# Altium PCB da12_v100.PcbDoc (part 1 of 5)
Units mil, origin at the board's own origin, x right, y up, seen from the top; angles counter-clockwise.
Board outline 4646.03 x 3622.4 mil, 4 copper layers (Top Layer, GND, POWER, Bottom Layer), stack 23.756 mil thick; 376 components, 191 nets, 1000 pads, 352 vias.
Unrouted connection lines stored in the file: 152.
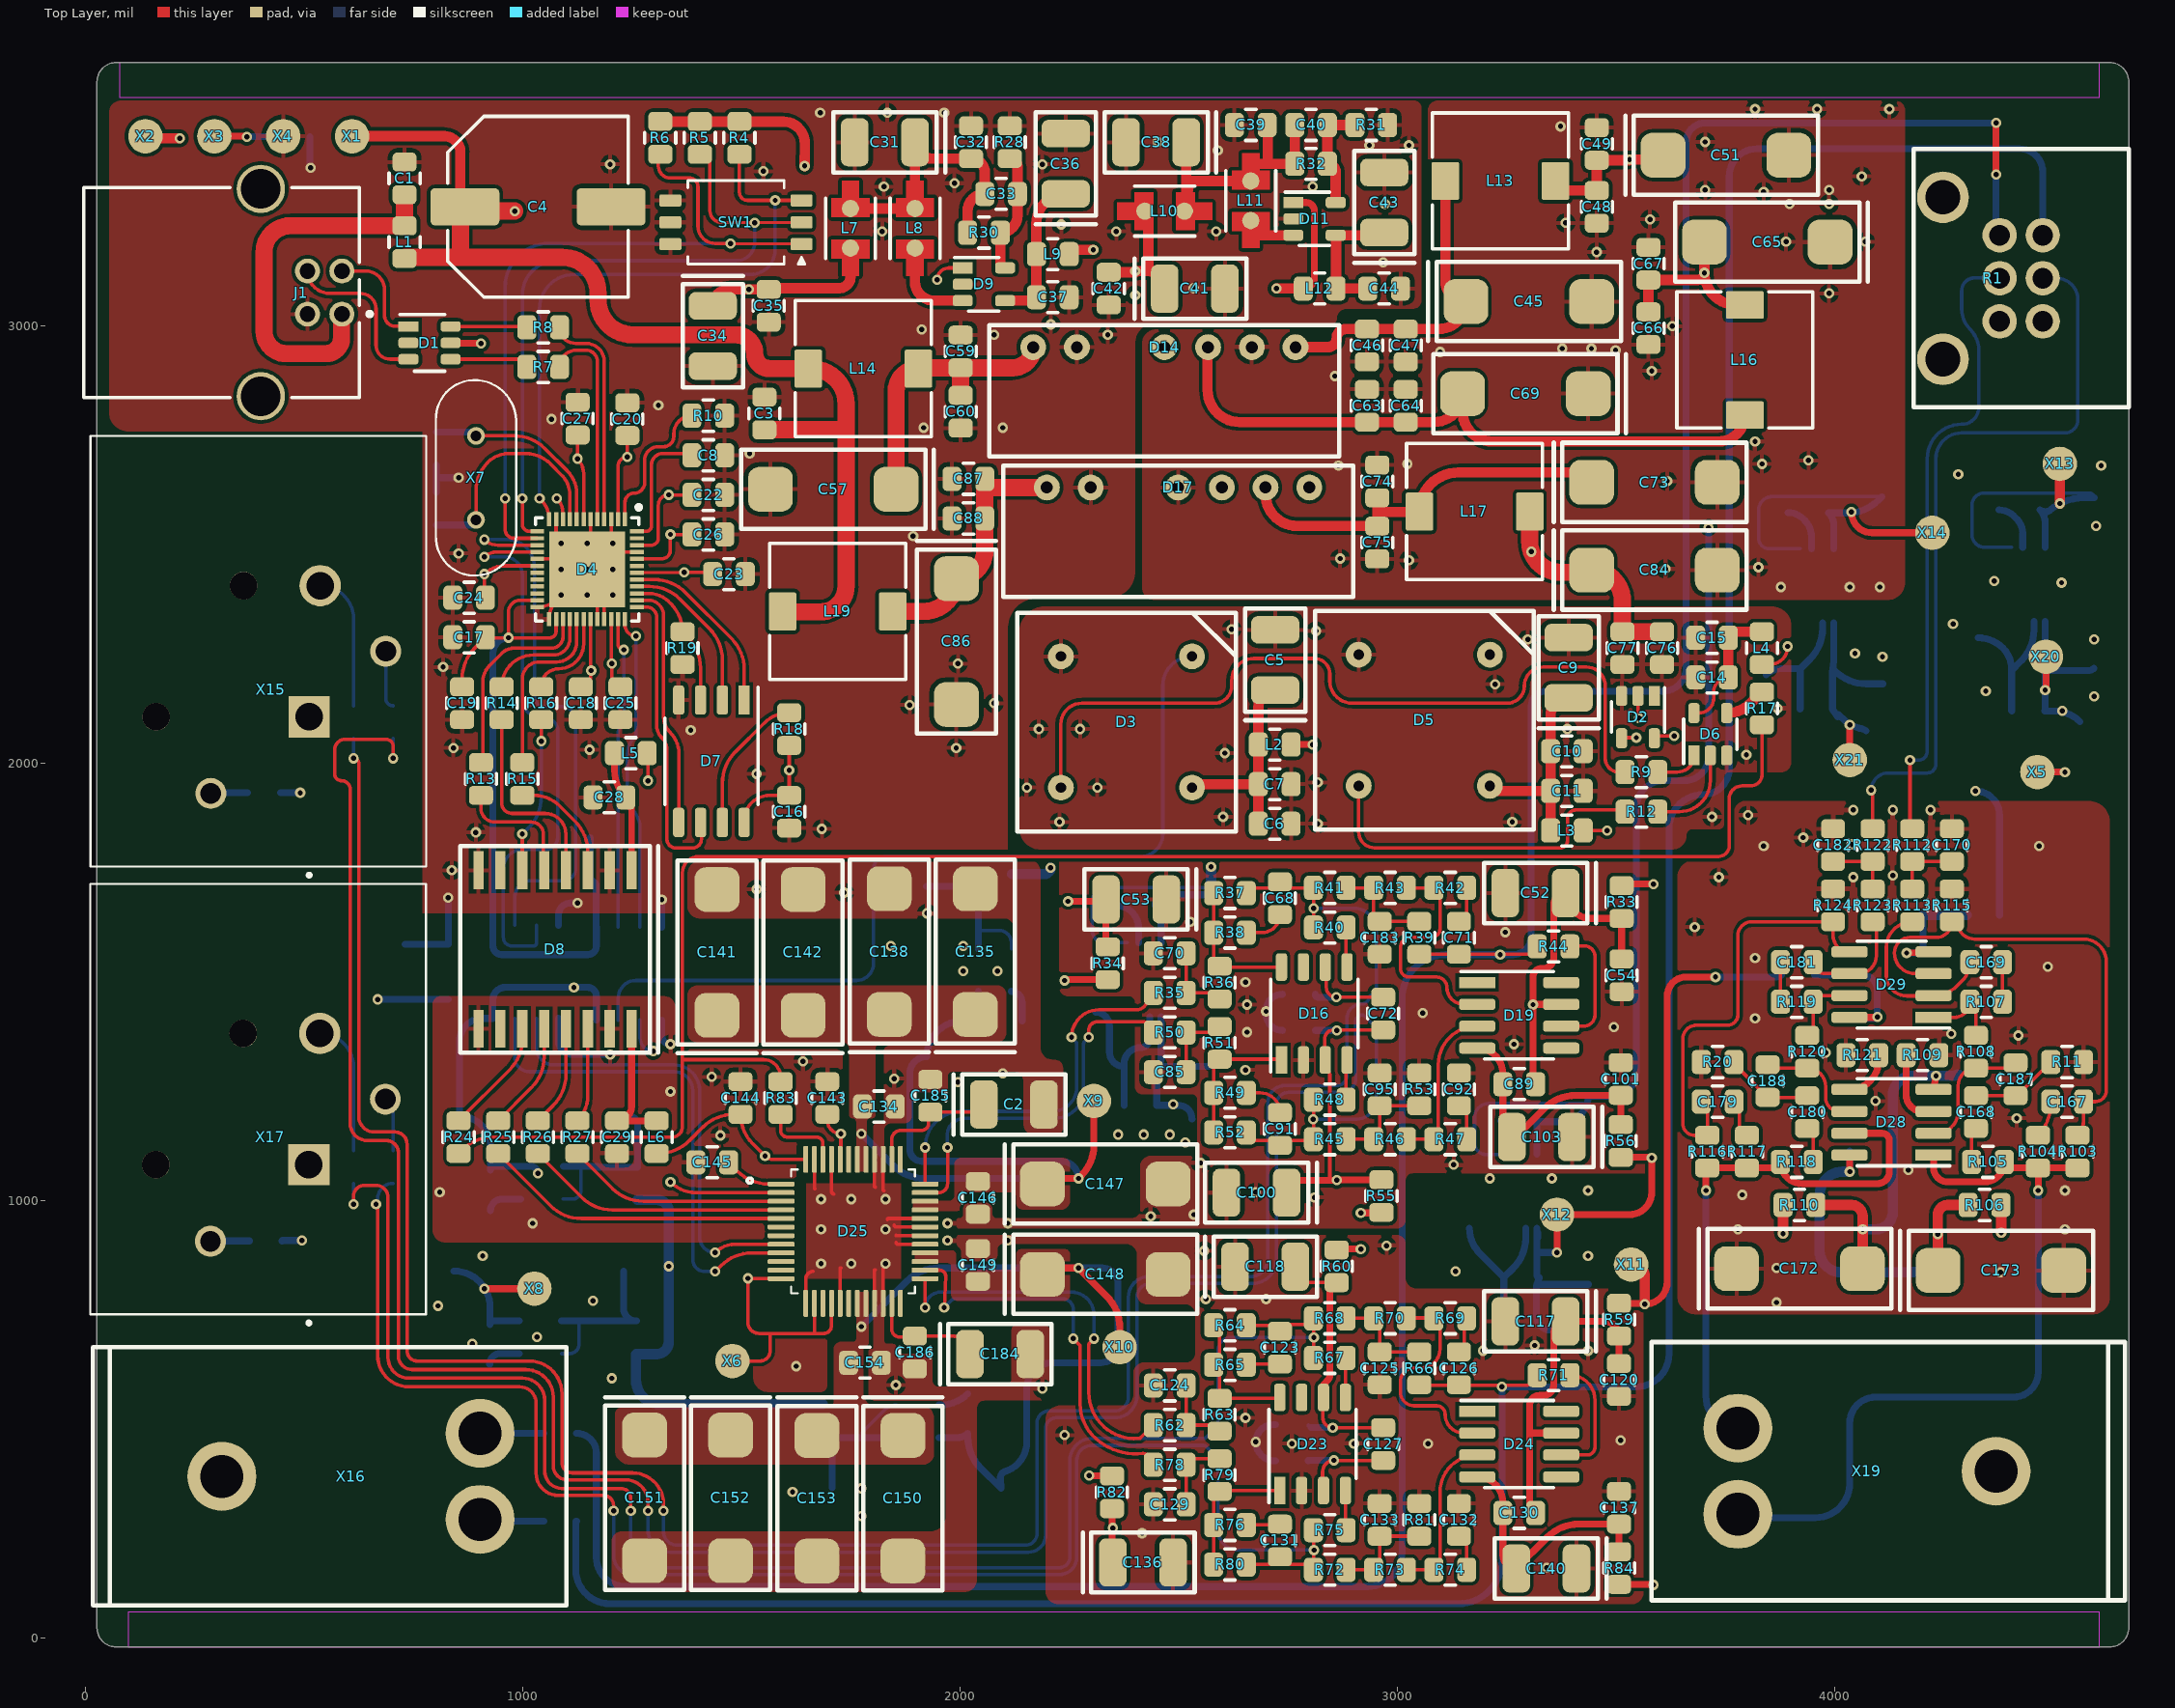
[diagram p0: Top Layer view]
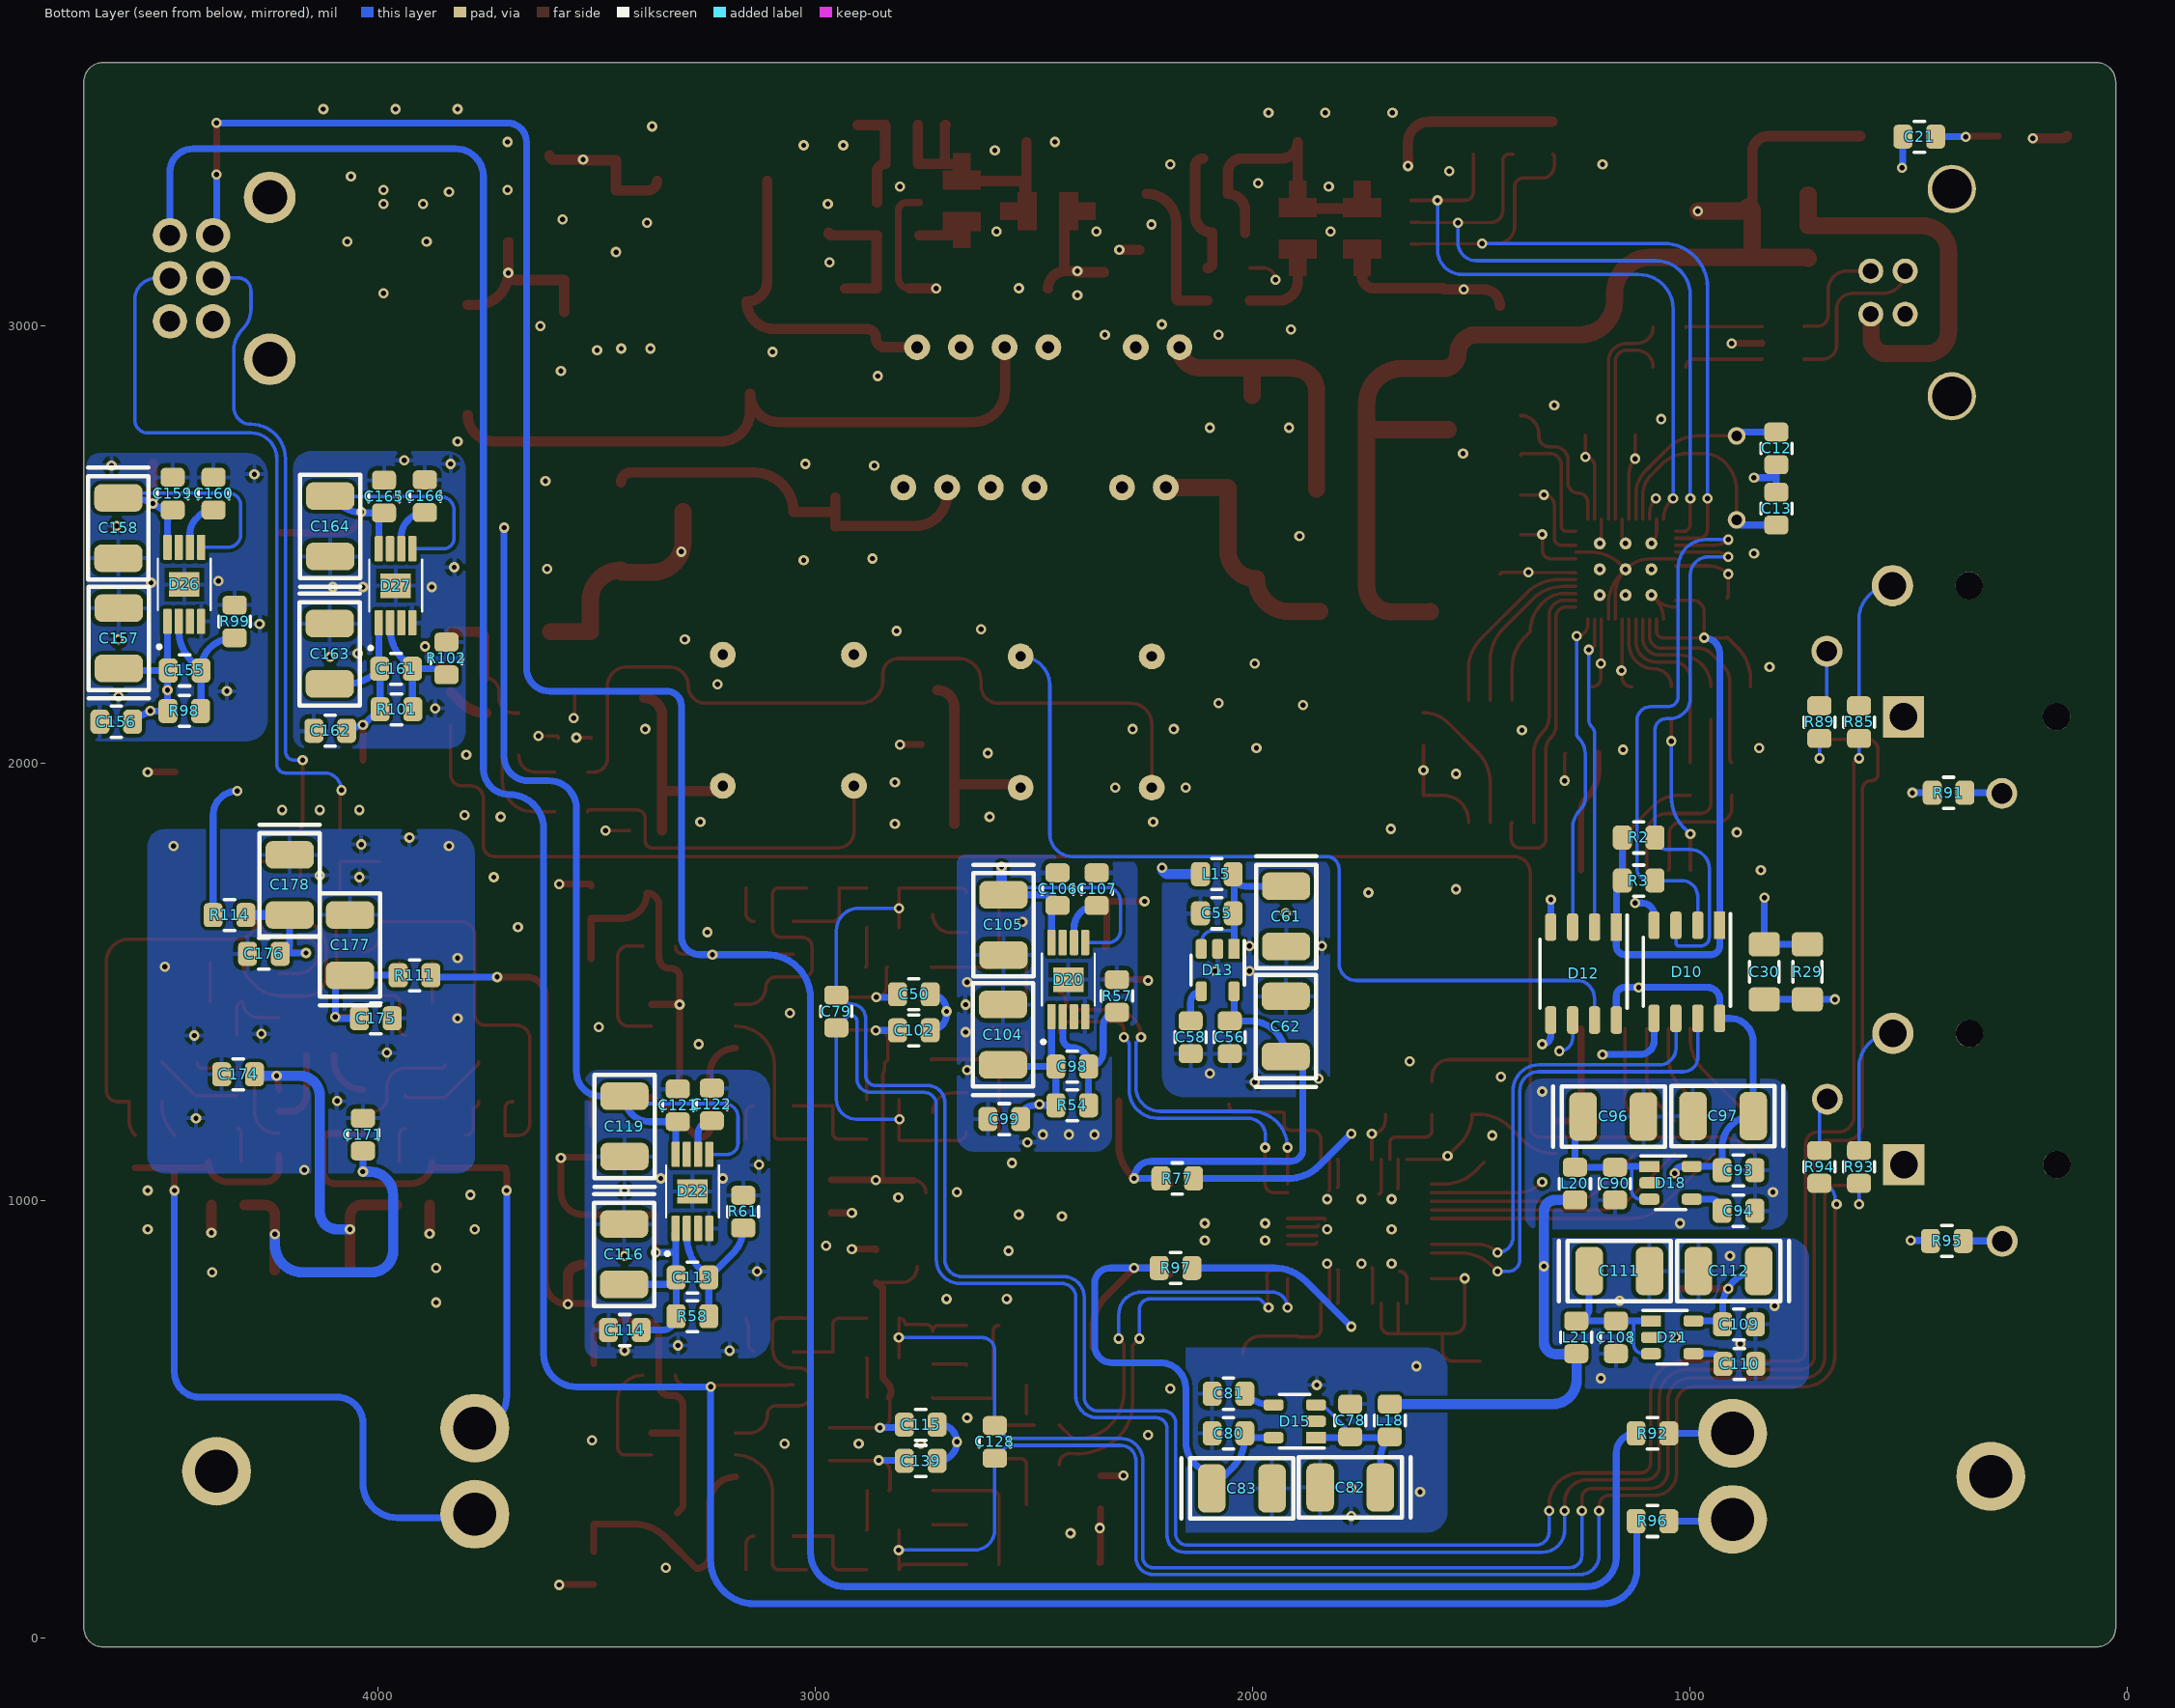
[diagram p1: Bottom Layer view, seen from below]
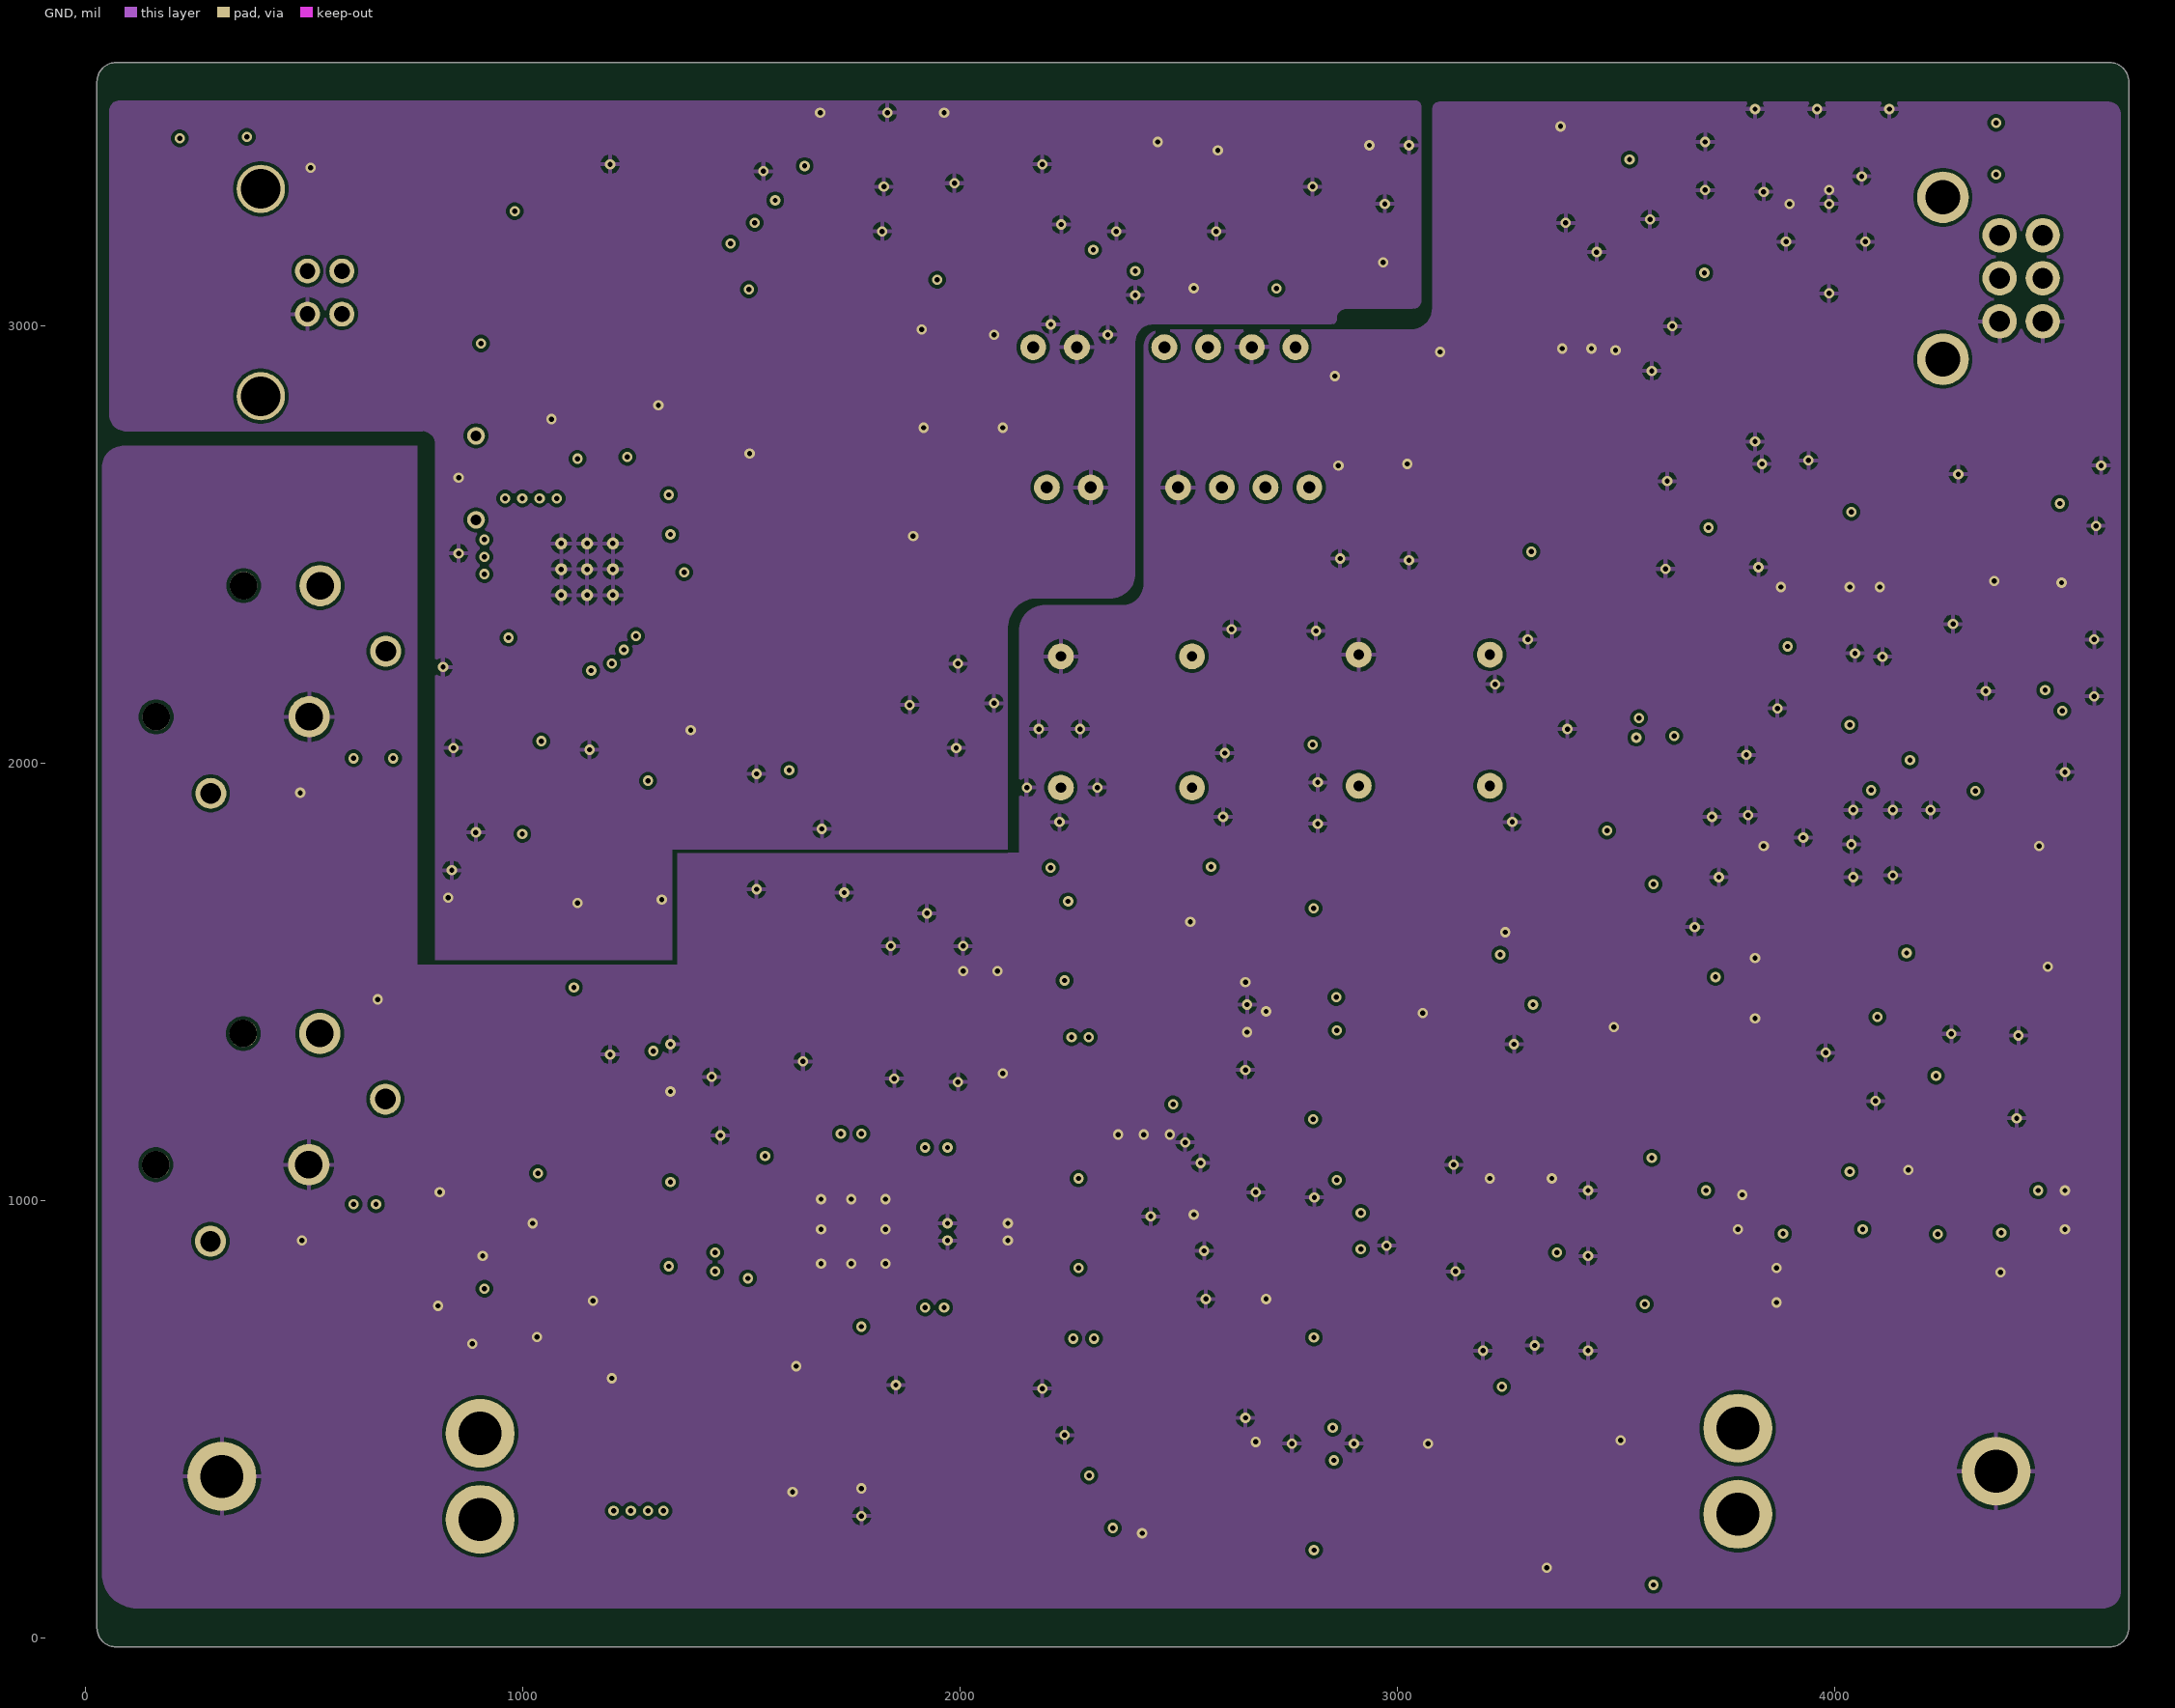
[diagram p2: GND]
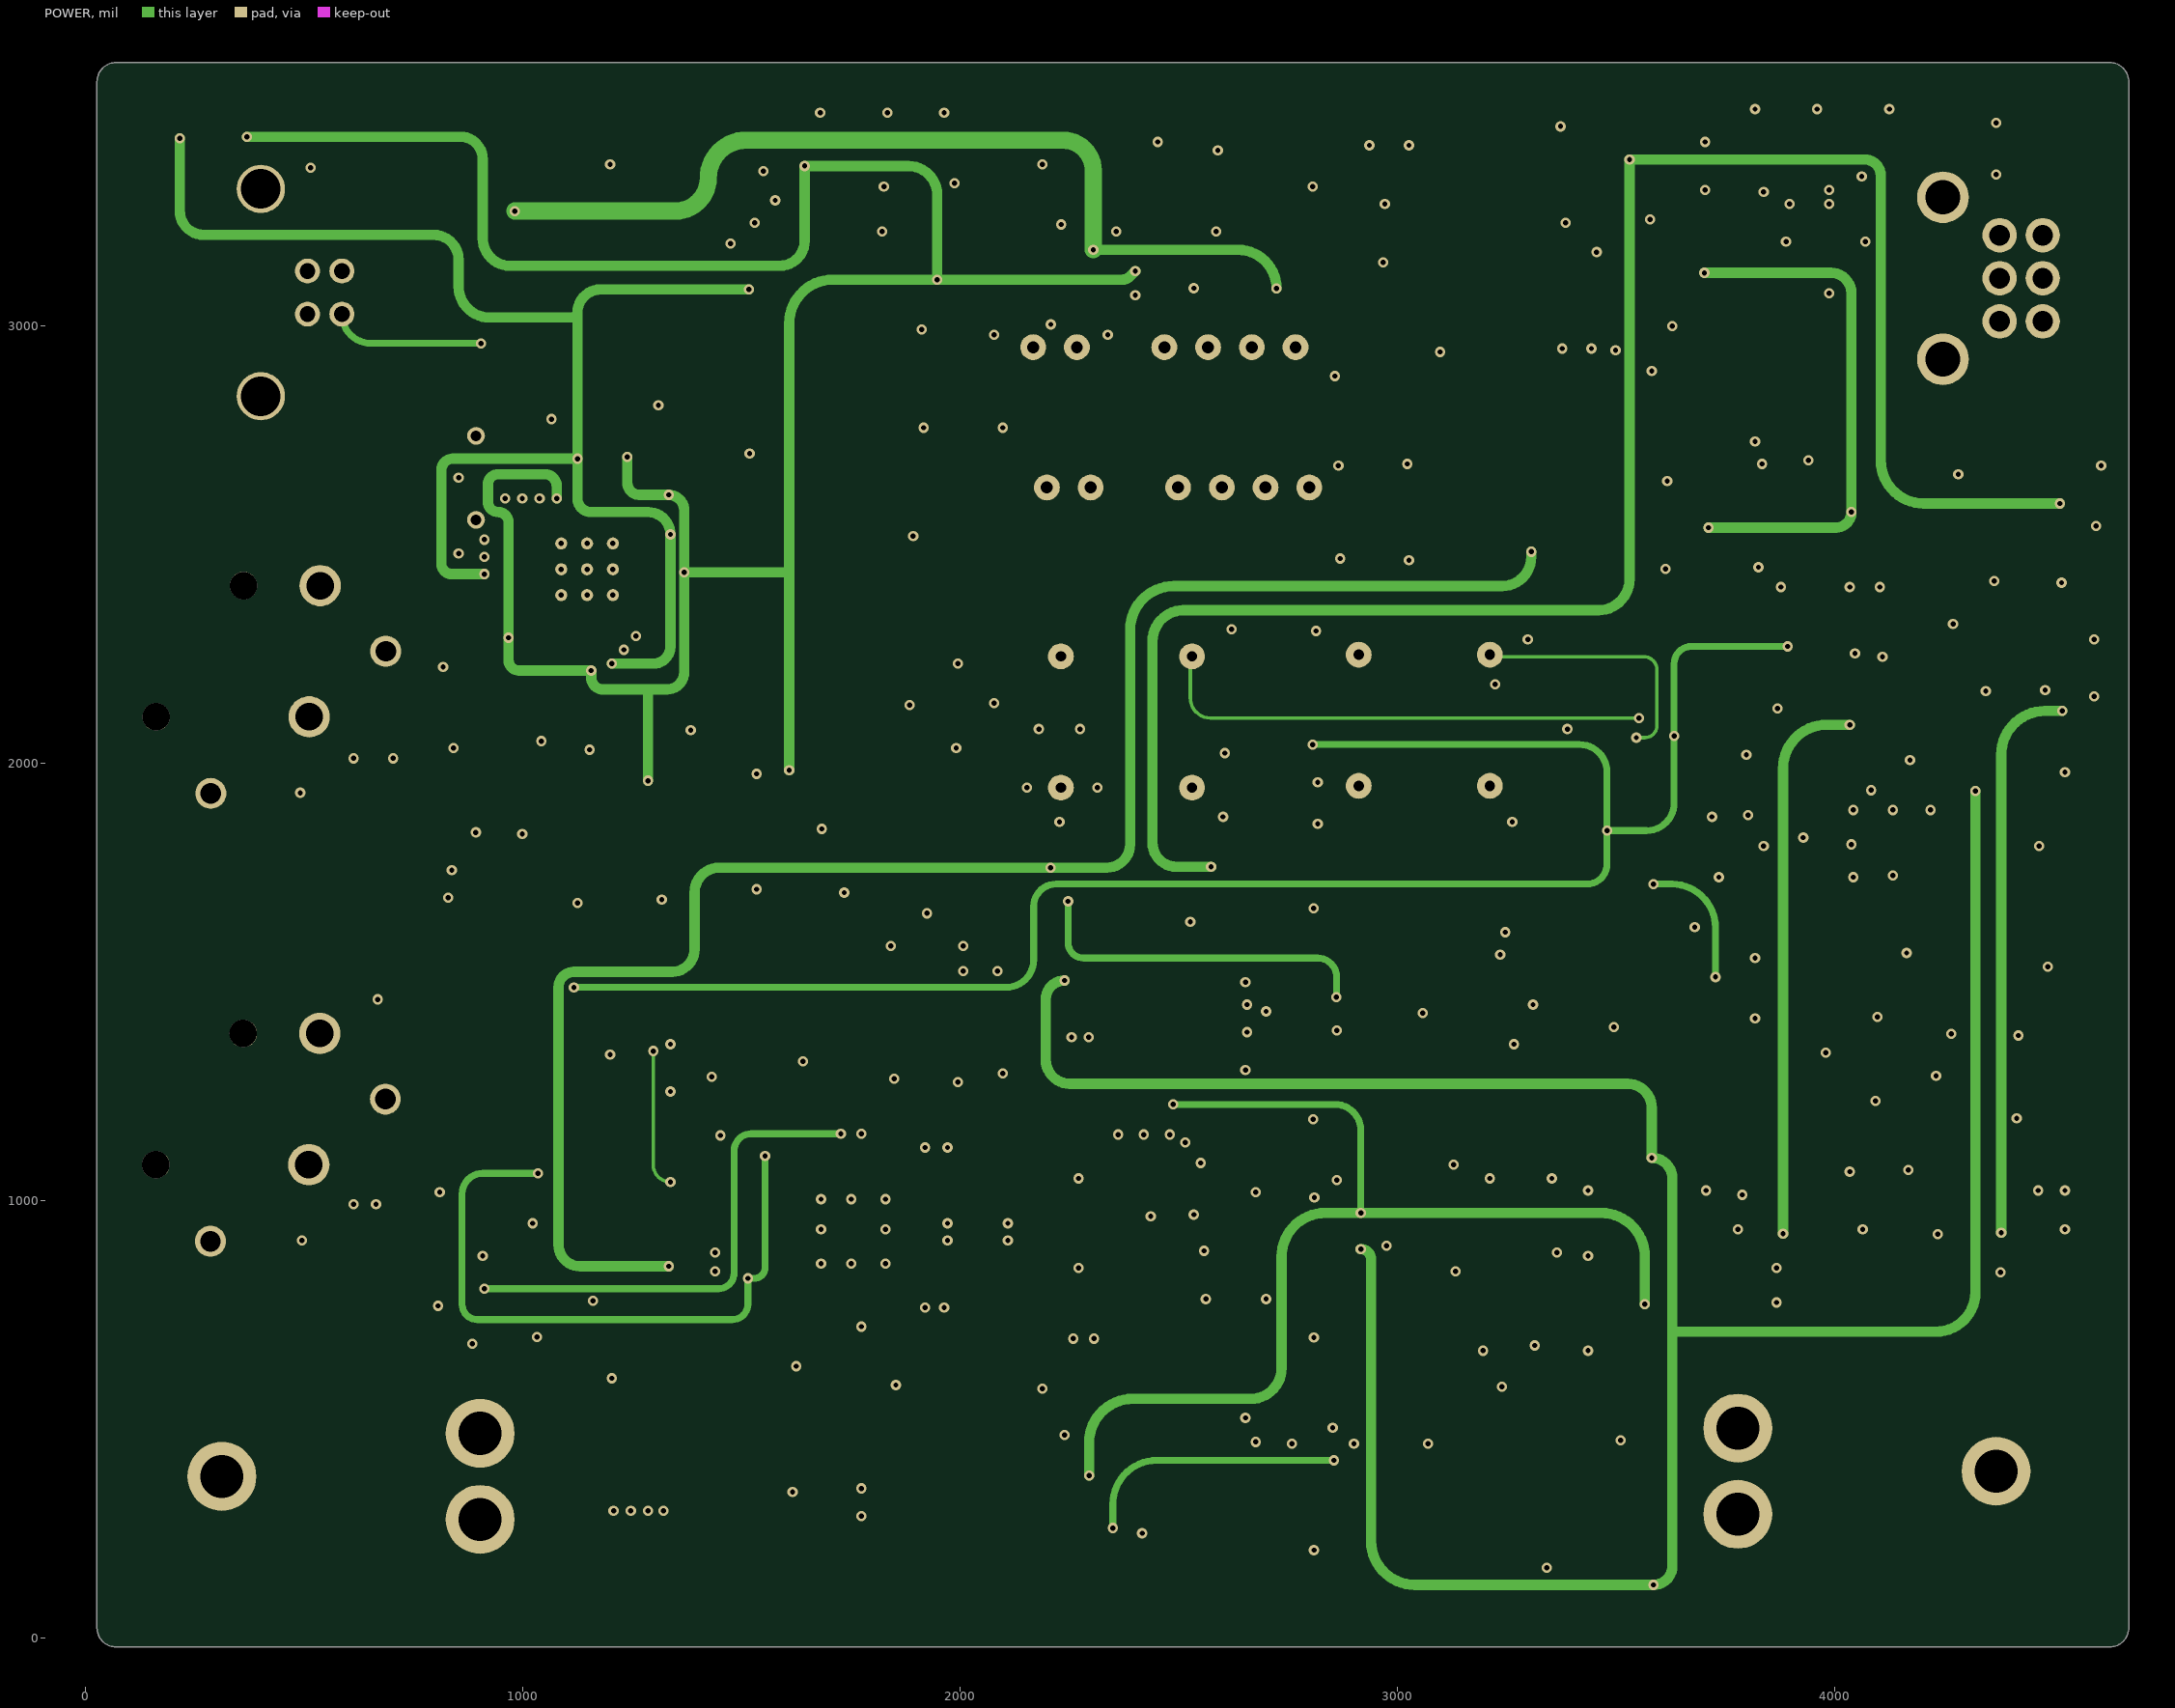
[diagram p3: POWER]
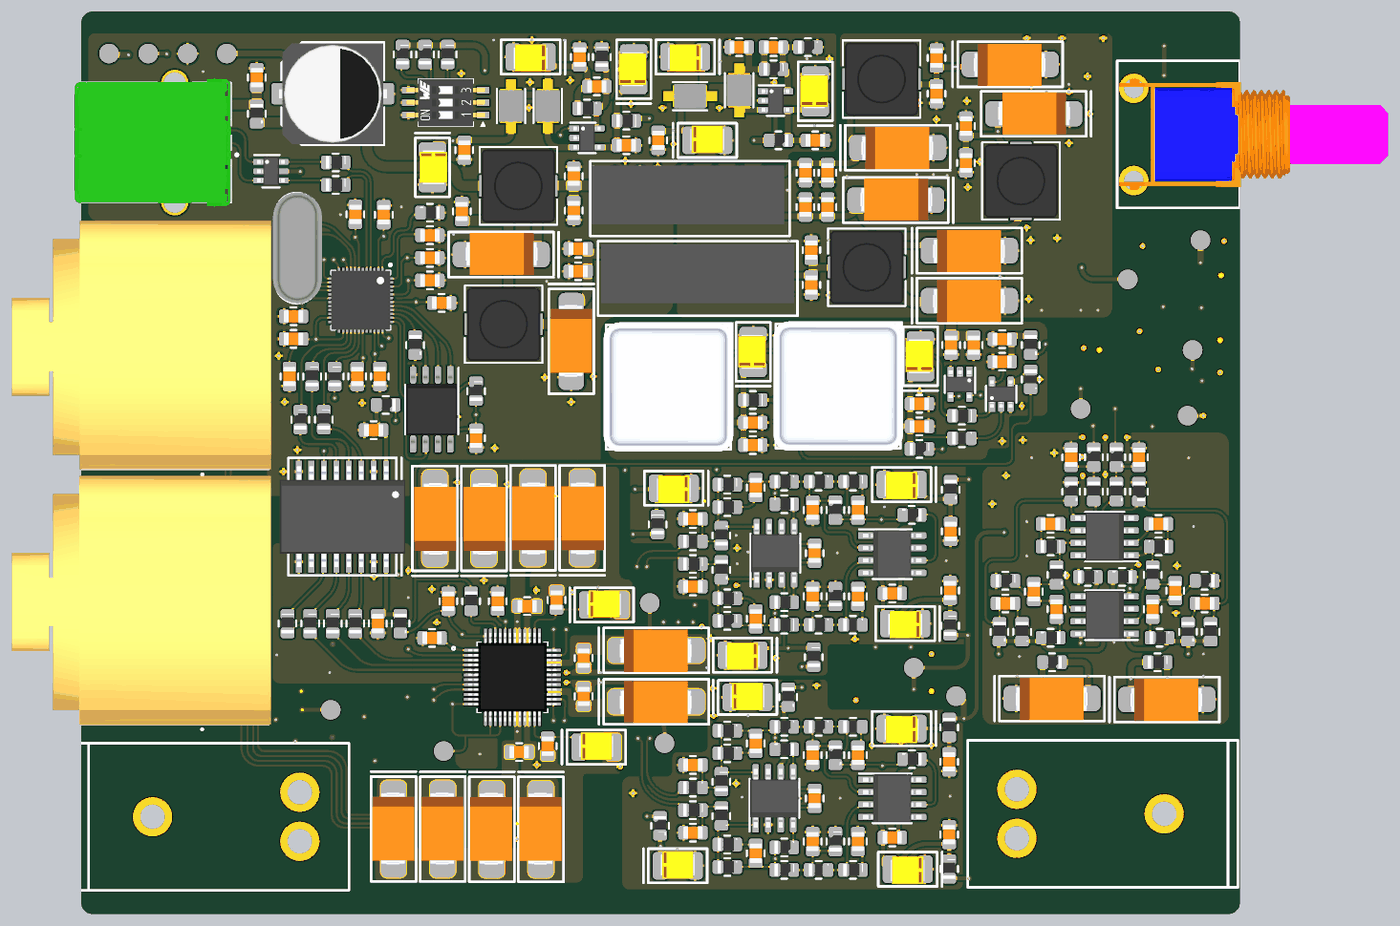
[diagram p6: 3D render of the assembled board from above, using the file's embedded part models]
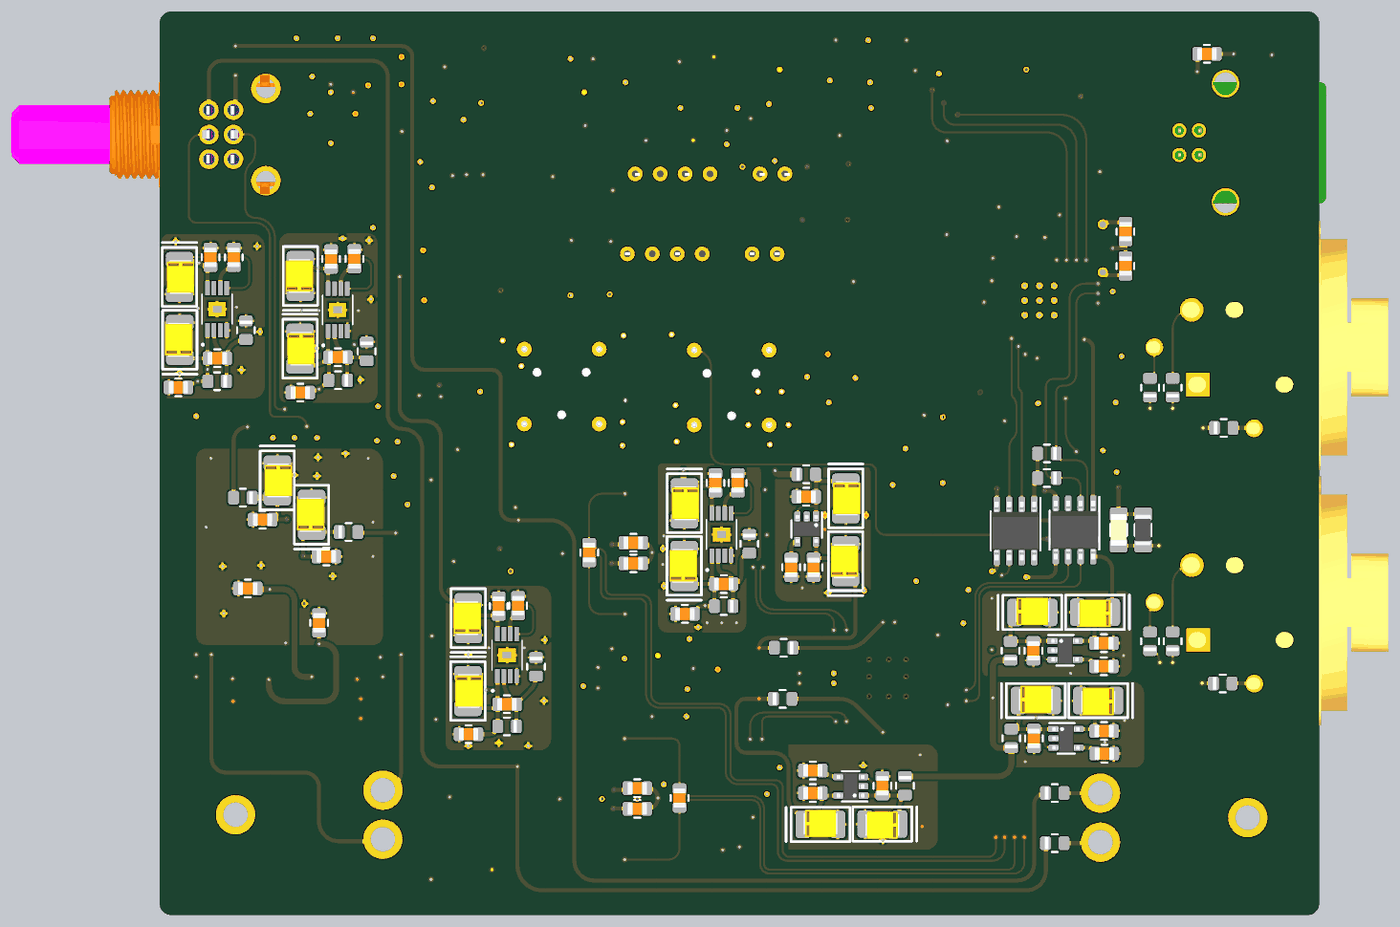
[diagram p7: 3D render of the assembled board from below, using the file's embedded part models]

## Layer stack, top to bottom
Top Solder: solder mask 0.4, Solder Resist, Dk 3.5
Top Layer: signal copper 1.4
Dielectric 2: prepreg 2.8, PP-006, Dk 4.1
GND: signal copper 1.378
Dielectric 1: dielectric 12.6, FR-4, Dk 4.8
POWER: signal copper 1.378
Dielectric 3: prepreg 2.8, PP-006, Dk 4.1
Bottom Layer: signal copper 1.4
Bottom Solder: solder mask 0.4, Solder Resist, Dk 3.5

## Board outline
70.87,-19.86 cw(c70.87,23.62) 27.38,23.62 27.38,3559.06 cw(c70.87,3559.06) 70.87,3602.54 4629.92,3602.54 cw(c4629.92,3559.06) 4673.41,3559.06 4673.41,23.62 cw(c4629.92,23.62) 4629.92,-19.86

## Design rules (kind name [scope] priority, off if disabled: settings)
Clearance [All] p1: gap=7.87 ignorepadtopadclearanceinfootprint=FALSE except(3.94: Arc-SMDPad Track-SMDPad SMDPad-SMDPad)
Height [All] p1: minheight=0 maxheight=1574.8 prefheight=500
HoleToHoleClearance [All] p1: gap=3.94 allowstackedmicrovias=TRUE
MinimumSolderMaskSliver [All] p1: minsoldermaskwidth=0
PolygonConnect [All] p1: connectstyle=Relief reliefconductorwidth=10 reliefentries=4 polygonreliefangle="90 Angle" airgapwidth=10
RoutingVias [All] p1: holewidth=28 width=50 viastyle="Through Hole" minholewidth=28 minwidth=50 maxholewidth=28 maxwidth=50
SilkToSolderMaskClearance [IsPad] p1: minsilkscreentomaskgap=0 clearancetoexposedcopper=TRUE
SolderMaskExpansion [All] p1: expansion=4 istentingtop=FALSE
Width [All] p1: maxlimit=39.37 minlimit=7.87 preferedwidth=10
26 further rules are at their usual default settings.

## Classes and differential pairs
component class ha: C155 C156 C157 C158 C159 C160 C161 C162 C163 C164 C165 C166 C167 C168 C169 C170 C171 C172 C173 C174 C175 C176 C177 C178 C179 C180 C181 C182 C187 C188 D26 D27 D28 D29 R1 R11 R20 R98 R99 R100 R101 R102 R103 R104 R105 R106 R107 R108 R109 R110 R111 R112 R113 R114 R115 R116 R117 R118 R119 R120 R121 R122 R123 R124 X19 X20 X21
component class DAC_4493: C2 C45 C46 C47 C48 C49 C50 C51 C52 C53 C54 C55 C56 C57 C58 C59 C60 C61 C62 C63 C64 C65 C66 C67 C68 C69 C70 C71 C72 C73 C74 C75 C76 C77 C78 C79 C80 C81 C82 C83 C84 C85 C86 C87 C88 C89 C90 C91 C92 C93 C94 C95 C96 C97 C98 C99 C100 C101 C102 C103 C104 C105 C106 C107 C108 C109 C110 C111 C112 C113 C114 C115 C116 C117 C118 C119 C120 C121 C122 C123 C124 C125 C126 C127 C128 C129 C130 C131 C132 C133 C134 C135 C136 C137 C138 C139 C140 C141 C142 C143 C144 C145 C146 C147 C148 C149 C150 C151 C152 C153 C154 C183 C184 C185 C186 D13 D14 D15 D16 D17 D18 D19 D20 D21 D22 D23 D24 D25 L13 L14 L15 L16 L17 L18 L19 L20 L21 R33 R34 R35 R36 R37 R38 R39 R40 R41 R42 R43 R44 R45 R46 R47 R48 R49 R50 R51 R52 R53 R54 R55 R56 R57 R58 R59 R60 R61 R62 R63 R64 R65 R66 R67 R68 R69 R70 R71 R72 R73 R74 R75 R76 R77 R78 R79 R80 R81 R82 R83 R84 R85 R89 R91 R92 R93 R94 R95 R96 R97 X8 X9 X10 X11 X12 X13 X14 X15 X16 X17
component class da12-mb: C1 C3 C4 C5 C6 C7 C8 C9 C10 C11 C12 C13 C14 C15 C16 C17 C18 C19 C20 C21 C22 C23 C24 C25 C26 C27 C28 C29 C30 C31 C32 C33 C34 C35 C36 C37 C38 C39 C40 C41 C42 C43 C44 D1 D2 D3 D4 D5 D6 D7 D8 D9 D10 D11 D12 J1 L1 L2 L3 L4 L5 L6 L7 L8 L9 L10 L11 L12 R2 R3 R4 R5 R6 R7 R8 R9 R10 R12 R13 R14 R15 R16 R17 R18 R19 R24 R25 R26 R27 R28 R29 R30 R31 R32 SW1 X1 X2 X3 X4 X5 X6 X7

## Components (designator, comment, footprint, x,y, rotation, side; value= is the part's Value field where it differs from the comment)
C1 "CC0805MRX7R9BB104" CAPC200X125X95L50N 730.71,3337.8 r90 top value=0.1u
C2 "Обозначение при заказе" TANT_B 2055.12,1220.47 r0 top
C3 "CC0805MRX7R9BB104" CAPC200X125X95L50N 1553.54,2800.39 r90 top value=0.1u
C4 "EEEFK1A102AP" CAPAE1030X1050L320X90N 1035.83,3272.83 r0 top value=1mX10V
C5 "Обозначение при заказе" TANT_B 2721.64,2167.72 r90 top
C6 "CC0805JRNPO9BN160" CAPC200X125X95L50N 2720.47,1862.2 r0 top value=16p
C7 "CC0805MRX7R9BB104" CAPC200X125X95L50N 2720.47,1952.76 r0 top value=0.1u
C8 "CC0805MRX7R9BB104" CAPC200X125X95L50N 1425.2,2704.72 r180 top value=0.1u
C9 "Обозначение при заказе" TANT_B 3392.52,2150 r90 top
C10 "CC0805JRNPO9BN160" CAPC200X125X95L50N 3388.58,2027.95 r0 top value=16p
C11 "CC0805MRX7R9BB104" CAPC200X125X95L50N 3388.58,1937.4 r0 top value=0.1u
C12 "CC0805JRNPO7BN220" CAPC200X125X95L50N 803.15,2720.47 r270 bottom value=22p
C13 "CC0805JRNPO7BN220" CAPC200X125X95L50N 803.15,2582.68 r270 bottom value=22p
C14 "CC0805JRNPO9BN160" CAPC200X125X95L50N 3720.47,2196.85 r180 top value=16p
C15 "CC0805MRX7R9BB104" CAPC200X125X95L50N 3720.47,2287.4 r180 top value=0.1u
C16 "CC0805MRX7R9BB104" CAPC200X125X95L50N 1610.24,1889.76 r270 top value=0.1u
C17 "CC0805MRX7R9BB104" CAPC200X125X95L50N 878.35,2288.58 r180 top value=0.1u
C18 "CC0805MRX7R9BB104" CAPC200X125X95L50N 1133.86,2137.8 r270 top value=0.1u
C19 "CC0805MRX7R9BB104" CAPC200X125X95L50N 862.2,2137.8 r270 top value=0.1u
C20 "CC0805MRX7R9BB104" CAPC200X125X95L50N 1240.16,2787.4 r90 top value=0.1u
C21 "CC0805MRX7R9BB104" CAPC200X125X95L50N 476.38,3433.07 r0 bottom value=0.1u
C22 "CC0805MRX7R9BB104" CAPC200X125X95L50N 1425.2,2614.17 r0 top value=0.1u
C23 "CC0805MRX7R9BB104" CAPC200X125X95L50N 1472.44,2433.07 r0 top value=0.1u
C24 "CC0805MRX7R9BB104" CAPC200X125X95L50N 878.35,2379.13 r180 top value=0.1u
C25 "CC0805MRX7R9BB104" CAPC200X125X95L50N 1224.41,2137.8 r270 top value=0.1u
C26 "CC0805MRX7R9BB104" CAPC200X125X95L50N 1425.2,2523.62 r0 top value=0.1u
C27 "CC0805MRX7R9BB104" CAPC200X125X95L50N 1126.38,2788.58 r90 top value=0.1u
C28 "CC0805MRX7R9BB104" CAPC200X125X95L50N 1199.21,1922.44 r0 top value=0.1u
C29 "CC0805MRX7R9BB104" CAPC200X125X95L50N 1216.54,1145.67 r270 top value=0.1u
C30 "GRM31CR71A226KE15L" CAPC320X160X180L55 830.71,1523.62 r270 bottom value=22u
C31 "Обозначение при заказе" TANT_B 1898.03,3420.47 r180 top
C32 "CC0805MRX7R9BB104" CAPC200X125X95L50N 2025.98,3420.47 r270 top value=0.1u
C33 "CC0805MRX7R9BB101" CAPC200X125X95L50N 2094.88,3302.36 r180 top value=100p
C34 "Обозначение при заказе" TANT_B 1435.43,3046.46 r270 top
C35 "CC0805MRX7R9BB104" CAPC200X125X95L50N 1563.39,3046.46 r90 top value=0.1u
C36 "Обозначение при заказе" TANT_B 2242.52,3302.36 r90 top
C37 "CC0805MRX7R9BB104" CAPC200X125X95L50N 2212.99,3066.14 r180 top value=0.1u
C38 "Обозначение при заказе" TANT_B 2518.11,3420.47 r180 top
C39 "CC0805MRX7R9BB104" CAPC200X125X95L50N 2665.75,3459.84 r0 top value=0.1u
C40 "CC0805MRX7R9BB101" CAPC200X125X95L50N 2803.54,3459.84 r180 top value=100p
C41 "Обозначение при заказе" TANT_B 2468.9,3085.83 r0 top
C42 "CC0805MRX7R9BB104" CAPC200X125X95L50N 2340.94,3085.83 r90 top value=0.1u
C43 "Обозначение при заказе" TANT_B 2970.87,3213.78 r90 top
C44 "CC0805MRX7R9BB104" CAPC200X125X95L50N 2970.87,3085.83 r180 top value=0.1u
C45 "Обозначение при заказе" TANT_D 3157.87,3056.3 r0 top
C46 "CC0805MRX7R9BB104" CAPC200X125X95L50N 2931.5,2955.91 r270 top value=0.1u
C47 "CC0805MRX7R9BB104" CAPC200X125X95L50N 3020.08,2955.91 r270 top value=0.1u
C48 "CC0805MRX7R9BB104" CAPC200X125X95L50N 3457.09,3272.83 r270 top value=0.1u
C49 "CC0805MRX7R9BB104" CAPC200X125X95L50N 3457.09,3416.54 r90 top value=0.1u
C50 "CC0805MRX7R9BB104" CAPC200X125X95L50N 2775.59,1472.44 r0 bottom value=0.1u
C51 "Обозначение при заказе" TANT_D 3608.66,3390.94 r0 top
C52 "Обозначение при заказе" TANT_B 3385.83,1703.82 r180 top
C53 "Обозначение при заказе" TANT_B 2472.44,1688.98 r180 top
C54 "CC0805MRX7R9BB104" CAPC200X125X95L50N 3513.78,1515.75 r270 top value=0.1u
C55 "CC0805MRX7R9BB104" CAPC200X125X95L50N 2082.68,1657.48 r0 bottom value=0.1u
C56 "CC0805MRX7R9BB104" CAPC200X125X95L50N 2053.15,1374.02 r270 bottom value=0.1u
C57 "Обозначение при заказе" TANT_D 1854.72,2627.17 r180 top
C58 "CC0805MRX7R9BB104" CAPC200X125X95L50N 2142.72,1374.02 r270 bottom value=0.1u
C59 "CC0805MRX7R9BB104" CAPC200X125X95L50N 2002.36,2942.13 r90 top value=0.1u
C60 "CC0805MRX7R9BB104" CAPC200X125X95L50N 2002.36,2804.33 r270 top value=0.1u
C61 "Обозначение при заказе" TANT_B 1924.21,1719.49 r270 bottom
C62 "Обозначение при заказе" TANT_B 1925.2,1329.72 r90 bottom
C63 "CC0805MRX7R9BB104" CAPC200X125X95L50N 2931.5,2818.11 r270 top value=0.1u
C64 "CC0805MRX7R9BB104" CAPC200X125X95L50N 3020.08,2818.11 r270 top value=0.1u
C65 "Обозначение при заказе" TANT_D 3990.55,3192.13 r180 top
C66 "CC0805MRX7R9BB104" CAPC200X125X95L50N 3575.2,2995.27 r90 top value=0.1u
C67 "CC0805MRX7R9BB104" CAPC200X125X95L50N 3575.2,3142.91 r270 top value=0.1u
C68 "CC0805MRX7R9BB104" CAPC200X125X95L50N 2732.28,1692.01 r90 top value=0.1u
C69 "Обозначение при заказе" TANT_D 3437.4,2845.67 r180 top
C70 "CC0805MRX7R9BB104" CAPC200X125X95L50N 2480.32,1566.02 r180 top value=0.1u
C71 "CC0805MRX7R9BB104" CAPC200X125X95L50N 3141.73,1601.46 r270 top value=0.1u
C72 "CC0805MRX7R9BB104" CAPC200X125X95L50N 2968.5,1428.23 r270 top value=0.1u
C73 "Обозначение при заказе" TANT_D 3445.28,2642.91 r0 top
C74 "CC0805MRX7R9BB104" CAPC200X125X95L50N 2955.12,2644.88 r90 top value=0.1u
C75 "CC0805MRX7R9BB104" CAPC200X125X95L50N 2955.12,2505.12 r270 top value=0.1u
C76 "CC0805MRX7R9BB104" CAPC200X125X95L50N 3606.3,2263.78 r270 top value=0.1u
C77 "CC0805MRX7R9BB104" CAPC200X125X95L50N 3515.75,2263.78 r270 top value=0.1u
C78 "CC0805MRX7R9BB104" CAPC200X125X95L50N 1777.56,498.03 r90 bottom value=0.1u
C79 "CC0805MRX7R9BB104" CAPC200X125X95L50N 2952.76,1433.07 r90 bottom value=0.1u
C80 "CC0805MRX7R9BB104" CAPC200X125X95L50N 2056.1,468.5 r0 bottom value=0.1u
C81 "CC0805MRX7R9BB104" CAPC200X125X95L50N 2056.1,559.05 r0 bottom value=0.1u
C82 "Обозначение при заказе" TANT_B 1708.66,344.49 r0 bottom
C83 "Обозначение при заказе" TANT_B 2094.49,342.52 r180 bottom
C84 "Обозначение при заказе" TANT_D 3445.28,2442.13 r0 top
C85 "CC0805MRX7R9BB104" CAPC200X125X95L50N 2480.32,1294.37 r0 top value=0.1u
C86 "Обозначение при заказе" TANT_D 1992.52,2422.44 r270 top
C87 "CC0805MRX7R9BB104" CAPC200X125X95L50N 2020.08,2650.79 r180 top value=0.1u
C88 "CC0805MRX7R9BB104" CAPC200X125X95L50N 2020.08,2560.24 r180 top value=0.1u
C89 "CC0805MRX7R9BB104" CAPC200X125X95L50N 3279.53,1266.81 r180 top value=0.1u
C90 "CC0805MRX7R9BB104" CAPC200X125X95L50N 1172.24,1039.37 r270 bottom value=0.1u
C91 "CC0805MRX7R9BB104" CAPC200X125X95L50N 2732.28,1164.45 r270 top value=0.1u
C92 "CC0805MRX7R9BB104" CAPC200X125X95L50N 3141.73,1255 r90 top value=0.1u
C93 "CC0805MRX7R9BB104" CAPC200X125X95L50N 889.76,1069.88 r180 bottom value=0.1u
C94 "CC0805MRX7R9BB104" CAPC200X125X95L50N 889.76,977.36 r180 bottom value=0.1u
C95 "CC0805MRX7R9BB104" CAPC200X125X95L50N 2960.63,1255 r90 top value=0.1u
C96 "Обозначение при заказе" TANT_B 1245.08,1192.91 r180 bottom
C97 "Обозначение при заказе" TANT_B 856.3,1193.9 r0 bottom
C98 "CC0805MRX7R9BB104" CAPC200X125X95L50N 2413.39,1307.09 r180 bottom value=0.1u
C99 "CC0805MRX7R9BB104" CAPC200X125X95L50N 2568.9,1187.01 r0 bottom value=0.1u
C100 "Обозначение при заказе" TANT_B 2748.03,1018.78 r180 top
C101 "CC0805MRX7R9BB104" CAPC200X125X95L50N 3511.81,1278.62 r270 top value=0.1u
C102 "CC0805MRX7R9BB104" CAPC200X125X95L50N 2775.59,1389.76 r180 bottom value=0.1u
C103 "Обозначение при заказе" TANT_B 3400.51,1145.83 r180 top
C104 "Обозначение при заказе" TANT_B 2571.85,1311.02 r90 bottom
C105 "Обозначение при заказе" TANT_B 2570.87,1699.8 r270 bottom
C106 "CC0805MRX7R9BB104" CAPC200X125X95L50N 2446.85,1712.6 r90 bottom value=0.1u
C107 "CC0805MRX7R9BB104" CAPC200X125X95L50N 2357.28,1712.6 r90 bottom value=0.1u
C108 "CC0805MRX7R9BB104" CAPC200X125X95L50N 1170.28,687.99 r270 bottom value=0.1u
C109 "CC0805MRX7R9BB104" CAPC200X125X95L50N 888.78,717.52 r180 bottom value=0.1u
C110 "CC0805MRX7R9BB104" CAPC200X125X95L50N 887.8,626.97 r180 bottom value=0.1u
C111 "Обозначение при заказе" TANT_B 1231.3,839.57 r180 bottom
C112 "Обозначение при заказе" TANT_B 843.5,839.57 r0 bottom
C113 "CC0805MRX7R9BB104" CAPC200X125X95L50N 3281.9,824.74 r180 bottom value=0.1u
C114 "CC0805MRX7R9BB104" CAPC200X125X95L50N 3436.43,704.66 r0 bottom value=0.1u
C115 "CC0805MRX7R9BB104" CAPC200X125X95L50N 2759.84,488.19 r0 bottom value=0.1u
C116 "Обозначение при заказе" TANT_B 3438.4,946.79 r270 bottom
C117 "Обозначение при заказе" TANT_B 3385.83,724.41 r180 top
C118 "Обозначение при заказе" TANT_B 2629.92,849.49 r0 top
C119 "Обозначение при заказе" TANT_B 3437.42,1101.32 r90 bottom
C120 "CC0805MRX7R9BB104" CAPC200X125X95L50N 3507.87,590.55 r270 top value=0.1u
C121 "CC0805MRX7R9BB104" CAPC200X125X95L50N 3315.37,1218.44 r90 bottom value=0.1u
C122 "CC0805MRX7R9BB104" CAPC200X125X95L50N 3237.61,1220.41 r90 bottom value=0.1u
C123 "CC0805MRX7R9BB104" CAPC200X125X95L50N 2732.28,664.45 r90 top value=0.1u
C124 "CC0805MRX7R9BB104" CAPC200X125X95L50N 2480.32,577.83 r180 top value=0.1u
C125 "CC0805MRX7R9BB104" CAPC200X125X95L50N 2960.63,617.2 r90 top value=0.1u
C126 "CC0805MRX7R9BB104" CAPC200X125X95L50N 3141.73,617.2 r270 top value=0.1u
C127 "CC0805MRX7R9BB104" CAPC200X125X95L50N 2968.5,443.98 r270 top value=0.1u
C128 "CC0805MRX7R9BB104" CAPC200X125X95L50N 2590.55,448.82 r270 bottom value=0.1u
C129 "CC0805MRX7R9BB104" CAPC200X125X95L50N 2480.32,306.18 r0 top value=0.1u
C130 "CC0805MRX7R9BB104" CAPC200X125X95L50N 3279.53,286.5 r180 top value=0.1u
C131 "CC0805MRX7R9BB104" CAPC200X125X95L50N 2732.28,223.5 r270 top value=0.1u
C132 "CC0805MRX7R9BB104" CAPC200X125X95L50N 3141.73,270.75 r90 top value=0.1u
C133 "CC0805MRX7R9BB104" CAPC200X125X95L50N 2960.63,270.75 r90 top value=0.1u
C134 "CC0805MRX7R9BB104" CAPC200X125X95L50N 1815.35,1215.63 r180 top value=0.1u
C135 "Обозначение при заказе" TANT_D 2035.83,1426.26 r90 top
C136 "Обозначение при заказе" TANT_B 2350.39,173.23 r0 top
C137 "CC0805MRX7R9BB104" CAPC200X125X95L50N 3507.87,298.31 r270 top value=0.1u
C138 "Обозначение при заказе" TANT_D 1838.98,1426.26 r90 top
C139 "CC0805MRX7R9BB104" CAPC200X125X95L50N 2759.84,405.51 r180 bottom value=0.1u
C140 "Обозначение при заказе" TANT_B 3410.51,159.45 r180 top
C141 "Обозначение при заказе" TANT_D 1445.27,1424.29 r90 top
C142 "Обозначение при заказе" TANT_D 1642.12,1424.29 r90 top
C143 "CC0805MRX7R9BB104" CAPC200X125X95L50N 1697.24,1235.31 r270 top value=0.1u
C144 "CC0805MRX7R9BB104" CAPC200X125X95L50N 1499.02,1235.24 r270 top value=0.1u
C145 "CC0805KKX7R9BB105" CAPC200X125X95L50N 1434.01,1088.11 r0 top value=1u
C146 "CC0805MRX7R9BB104" CAPC200X125X95L50N 2041.73,1006.97 r270 top value=0.1u
C147 "Обозначение при заказе" TANT_D 2189.37,1038.46 r0 top
C148 "Обозначение при заказе" TANT_D 2189.37,831.77 r0 top
C149 "CC0805MRX7R9BB104" CAPC200X125X95L50N 2041.73,853.42 r270 top value=0.1u
C150 "Обозначение при заказе" TANT_D 1870.47,463.66 r270 top
C151 "Обозначение при заказе" TANT_D 1279.53,464.57 r270 top
C152 "Обозначение при заказе" TANT_D 1476.38,464.57 r270 top
C153 "Обозначение при заказе" TANT_D 1673.62,463.66 r270 top
C154 "CC0805MRX7R9BB104" CAPC200X125X95L50N 1783.46,629.92 r0 top value=0.1u
C155 "CC0805MRX7R9BB104" CAPC200X125X95L50N 4442.91,2212.6 r180 bottom value=0.1u
C156 "CC0805MRX7R9BB104" CAPC200X125X95L50N 4599.41,2095.47 r0 bottom value=0.1u
C157 "Обозначение при заказе" TANT_B 4593.5,2217.52 r90 bottom
C158 "Обозначение при заказе" TANT_B 4594.49,2607.28 r270 bottom
C159 "CC0805MRX7R9BB104" CAPC200X125X95L50N 4470.47,2617.13 r90 bottom value=0.1u
C160 "CC0805MRX7R9BB104" CAPC200X125X95L50N 4376.97,2617.13 r90 bottom value=0.1u
C161 "CC0805MRX7R9BB104" CAPC200X125X95L50N 3959.65,2216.54 r180 bottom value=0.1u
C162 "CC0805MRX7R9BB104" CAPC200X125X95L50N 4110.24,2074.8 r0 bottom value=0.1u
C163 "Обозначение при заказе" TANT_B 4111.22,2319.88 r270 bottom
C164 "Обозначение при заказе" TANT_B 4110.24,2473.43 r90 bottom
C165 "CC0805MRX7R9BB104" CAPC200X125X95L50N 3987.2,2610.24 r90 bottom value=0.1u
C166 "CC0805MRX7R9BB104" CAPC200X125X95L50N 3893.7,2611.22 r90 bottom value=0.1u
C167 "CC0805MRX7R9BB104" CAPC200X125X95L50N 4532.64,1226.81 r180 top value=0.1u
C168 "CC0805MRX7R9BB104" CAPC200X125X95L50N 4323.98,1203.18 r270 top value=0.1u
C169 "CC0805MRX7R9BB104" CAPC200X125X95L50N 4347.6,1545.7 r0 top value=0.1u
C170 "CC0805MRX7R9BB104" CAPC200X125X95L50N 4268.86,1813.42 r90 top value=0.1u
C171 "CC0805MRX7R9BB104" CAPC200X125X95L50N 4035.43,1151.57 r90 bottom value=0.1u
C172 "Обозначение при заказе" TANT_D 3776.74,844.92 r0 top
C173 "Обозначение при заказе" TANT_D 4237.37,840.98 r0 top
C174 "CC0805MRX7R9BB104" CAPC200X125X95L50N 4320.87,1289.37 r0 bottom value=0.1u
C175 "CC0805MRX7R9BB104" CAPC200X125X95L50N 4005.91,1417.32 r180 bottom value=0.1u
C176 "CC0805MRX7R9BB104" CAPC200X125X95L50N 4261.81,1564.96 r0 bottom value=0.1u
C177 "Обозначение при заказе" TANT_B 4064.96,1515.75 r90 bottom
C178 "Обозначение при заказе" TANT_B 4202.76,1791.34 r270 bottom
C179 "CC0805MRX7R9BB104" CAPC200X125X95L50N 3733.43,1226.81 r0 top value=0.1u
C180 "CC0805MRX7R9BB104" CAPC200X125X95L50N 3938.15,1203.18 r270 top value=0.1u
C181 "CC0805MRX7R9BB104" CAPC200X125X95L50N 3914.53,1545.7 r180 top value=0.1u
C182 "CC0805MRX7R9BB104" CAPC200X125X95L50N 3997.21,1813.42 r90 top value=0.1u
C183 "CC0805MRX7R9BB104" CAPC200X125X95L50N 2960.63,1601.46 r90 top value=0.1u
C184 "Обозначение при заказе" TANT_B 2023.62,649.61 r0 top
C185 "CC0805MRX7R9BB104" CAPC200X125X95L50N 1933.07,1240.16 r90 top value=0.1u
C186 "CC0805MRX7R9BB104" CAPC200X125X95L50N 1897.64,653.54 r270 top value=0.1u
C187 "CC0805MRX7R9BB104" CAPC200X125X95L50N 4414.53,1277.99 r90 top value=0.1u
C188 "CC0805MRX7R9BB104" CAPC200X125X95L50N 3847.6,1274.05 r90 top value=0.1u
D1 "USBLC6-4SC6" SOT23-6P95_280X145L45X40N 787.8,2961.81 r0 top
D2 "SN74LVC1G14DBVR" SOT23-5P95_280X145L45X40N 3551.18,2106.3 r180 top value=SN74LVC1G14
D3 "Обозначение при заказе" DIL4 2531.5,2244.88 r180 top
D4 "Обозначение при заказе" "48-QFN (6x6)" 1148.03,2444.09 r270 top
D5 "Обозначение при заказе" DIL4 3212.6,2248.82 r180 top
D6 "Обозначение при заказе" SOT23-5P95_280X145L45X40N 3716.54,2066.93 r0 top
D7 "W25Q32JVSS" SOIC8P127_528X790X100L65X41N 1432.48,2005.12 r270 top value=W25Q32
D8 "Обозначение при заказе" adum1400 1074.8,1574.8 r180 top
D9 "Обозначение при заказе" SOT23-5P95_280X145L45X40N 2055.51,3095.67 r270 top
D10 "Обозначение при заказе" SOIC8P127_490X600X175L65X42N 1007.87,1523.62 r270 bottom
D11 "Обозначение при заказе" SOT23-5P95_280X145L45X40N 2811.42,3245.28 r270 top
D12 "Обозначение при заказе" SOIC8P127_490X600X175L65X42N 1244.09,1519.68 r270 bottom
D13 "Обозначение при заказе" SOT23-5P95_280X145L45X40N 2080.71,1527.56 r0 bottom
D14 "Обозначение при заказе" AM3D-0509DH30Z 2168.11,2901.97 r0 top
D15 "Обозначение при заказе" SOT23-5P95_280X145L45X40N 1904.5,496.06 r90 bottom
D16 "Обозначение при заказе" SOIC8P127_490X600X175L65X42N 2811.02,1428.23 r90 top
D17 "Обозначение при заказе" AM3D-0509SZ 2199.61,2581.1 r0 top
D18 "Обозначение при заказе" SOT23-5P95_280X145L45X40N 1045.28,1041.34 r270 bottom
D19 "Обозначение при заказе" SOIC8P127_490X600X175L83X42N 3279.53,1424.29 r0 top
D20 "Обозначение при заказе" SOP65P490X110-9N 2422.24,1505.91 r90 bottom
D21 "Обозначение при заказе" SOT23-5P95_280X145L45X40N 1041.34,687.99 r270 bottom
D22 "Обозначение при заказе" SOP65P490X110-9N 3281.9,1021.59 r90 bottom
D23 "Обозначение при заказе" SOIC8P127_490X600X175L65X42N 2807.09,443.98 r90 top
D24 "Обозначение при заказе" SOIC8P127_490X600X175L83X42N 3279.53,443.98 r0 top
D25 "Обозначение при заказе" QFP50P900X900X160-48N 1756.3,930.2 r0 top
D26 "Обозначение при заказе" SOP65P490X110-9N 4443.9,2409.45 r90 bottom
D27 "Обозначение при заказе" SOP65P490X110-9N 3960.63,2406.5 r90 bottom
D28 "LM258DR" SOIC8P127_490X600X175L83X42N 4131.07,1179.56 r180 top value=LM258
D29 "LM258DR" SOIC8P127_490X600X175L83X42N 4131.07,1494.52 r180 top value=LM258
J1 "61729-1011BLF" FCI-61729-1011BLF_V 494.69,3076.77 r270 top locked
L1 "Обозначение при заказе" RESC200X125X60L35 730.71,3192.13 r270 top
L2 "Обозначение при заказе" RESC200X125X60L35 2720.47,2043.31 r0 top
L3 "Обозначение при заказе" RESC200X125X60L35 3388.58,1846.85 r0 top
L4 "Обозначение при заказе" RESC200X125X60L35 3834.65,2263.78 r270 top
L5 "Обозначение при заказе" RESC200X125X60L35 1248.03,2023.62 r180 top
L6 "Обозначение при заказе" RESC200X125X60L35 1307.09,1145.67 r270 top
L7 "LQH2MCN220K02L" INDM320X250X220L90X200N 1750.39,3223.62 r90 top value=1210
L8 "LQH2MCN220K02L" INDM320X250X220L90X200N 1898.03,3223.62 r270 top value=1210
L9 "Обозначение при заказе" RESC200X125X60L35 2212.99,3164.57 r0 top
L10 "LQH2MCN220K02L" INDM320X250X220L90X200N 2468.9,3262.99 r0 top value=1210
L11 "LQH2MCN220K02L" INDM320X250X220L90X200N 2665.75,3286.61 r270 top value=1210
L12 "Обозначение при заказе" RESC200X125X60L35 2823.23,3085.83 r180 top
L13 "CDRH74NP-471MC" INDM730X730X450L90X180N 3236.61,3331.89 r0 top value=CDRH74
L14 "CDRH74NP-471MC" INDM730X730X450L90X180N 1779.92,2902.76 r0 top value=CDRH74
L15 "Обозначение при заказе" RESC200X125X60L35 2082.68,1747.05 r180 bottom
L16 "CDRH74NP-471MC" INDM730X730X450L90X180N 3795.67,2922.44 r90 top value=CDRH74
L17 "CDRH74NP-471MC" INDM730X730X450L90X180N 3177.56,2575.98 r0 top value=CDRH74
L18 "Обозначение при заказе" RESC200X125X60L35 1687.01,498.03 r270 bottom
L19 "CDRH74NP-471MC" INDM730X730X450L90X180N 1720.87,2347.64 r0 top value=CDRH74
L20 "Обозначение при заказе" RESC200X125X60L35 1263.78,1039.37 r90 bottom
L21 "Обозначение при заказе" RESC200X125X60L35 1260.83,687.99 r90 bottom
R1 "Обозначение при заказе" RK09L 4476.77,3109.45 r0 top locked
R2 "RC0805JR-0710KL" RESC200X125X60L35 1118.11,1830.71 r0 bottom value=10k
R3 "RC0805JR-0710KL" RESC200X125X60L35 1118.11,1732.28 r0 bottom value=10k
R4 "RC0805JR-0710KL" RESC200X125X60L35 1496.46,3430.32 r90 top value=10k
R5 "RC0805JR-0710KL" RESC200X125X60L35 1405.91,3430.32 r90 top value=10k
R6 "RC0805JR-0710KL" RESC200X125X60L35 1315.35,3430.32 r90 top value=10k
R7 "RC0805JR-0724RL" RESC200X125X60L35 1047.64,2906.69 r0 top value=24
R8 "RC0805JR-0724RL" RESC200X125X60L35 1047.64,2997.24 r0 top value=24
R9 "RC0805JR-0710RL" RESC200X125X60L35 3559.06,1980.32 r0 top value=10
R10 "RC0805JR-0718RL" RESC200X125X60L35 1425.2,2795.28 r180 top value=18
R11 "RC0805JR-071KL" RESC200X125X60L35 4532.64,1317.36 r180 top value=1k
R12 "RC0805JR-0710RL" RESC200X125X60L35 3559.06,1889.76 r0 top value=10
R13 "RC0805JR-0710RL" RESC200X125X60L35 905.51,1964.57 r90 top value=10
R14 "RC0805JR-0710RL" RESC200X125X60L35 952.76,2137.8 r90 top value=10
R15 "RC0805JR-0710RL" RESC200X125X60L35 1000,1964.57 r90 top value=10
R16 "RC0805JR-0710RL" RESC200X125X60L35 1043.31,2137.8 r90 top value=10
R17 "RC0805JR-0710RL" RESC200X125X60L35 3834.65,2125.98 r270 top value=10
R18 "RC0805JR-07100KL" RESC200X125X60L35 1610.24,2078.74 r90 top value=100k
R19 "RC0805JR-07100KL" RESC200X125X60L35 1366.14,2263.78 r270 top value=100k
R20 "RC0805JR-071KL" RESC200X125X60L35 3733.43,1317.36 r0 top value=1k
R24 "RC0805JR-0710RL" RESC200X125X60L35 854.33,1145.67 r90 top value=10
R25 "RC0805JR-0710RL" RESC200X125X60L35 944.88,1145.67 r90 top value=10
R26 "RC0805JR-0710RL" RESC200X125X60L35 1035.43,1145.67 r90 top value=10
R27 "RC0805JR-0710RL" RESC200X125X60L35 1125.98,1145.67 r90 top value=10
R28 "RC0805JR-0710KL" RESC200X125X60L35 2114.57,3420.47 r90 top value=10k
R29 "RC1206JR-07200KL" RESC310X160X65L40N 732.28,1523.62 r270 bottom value=200k
R30 "RC0805JR-0710KL" RESC200X125X60L35 2055.51,3213.78 r0 top value=10k
R31 "RC0805JR-0710KL" RESC200X125X60L35 2941.34,3459.84 r0 top value=10k
R32 "RC0805JR-0710KL" RESC200X125X60L35 2803.54,3371.26 r0 top value=10k
R33 "RC0805JR-0710RL" RESC200X125X60L35 3513.78,1683.07 r270 top value=10
R34 "RC0805JR-0710RL" RESC200X125X60L35 2338.58,1543.31 r90 top value=10
R35 "RC0805JR-072K2L" RESC200X125X60L35 2480.32,1475.47 r0 top value=2k2
R36 "RC0805JR-072K2L" RESC200X125X60L35 2594.49,1499.09 r90 top value=2k2
R37 "RC0805JR-072K2L" RESC200X125X60L35 2618.11,1703.82 r0 top value=2k2
R38 "RC0805JR-072K2L" RESC200X125X60L35 2618.11,1613.27 r0 top value=2k2
R39 "RC0805JR-072K2L" RESC200X125X60L35 3051.18,1601.46 r270 top value=2k2
R40 "RC0805JR-0710RL" RESC200X125X60L35 2846.46,1625.08 r180 top value=10
R41 "RC0805JR-072K2L" RESC200X125X60L35 2846.46,1715.63 r0 top value=2k2
R42 "RC0805JR-072K2L" RESC200X125X60L35 3122.05,1715.63 r0 top value=2k2
R43 "RC0805JR-072K2L" RESC200X125X60L35 2984.25,1715.63 r0 top value=2k2
R44 "RC0805JR-0710RL" RESC200X125X60L35 3358.27,1581.77 r180 top value=10
R45 "RC0805JR-072K2L" RESC200X125X60L35 2846.46,1140.83 r0 top value=2k2
R46 "RC0805JR-072K2L" RESC200X125X60L35 2984.25,1140.83 r0 top value=2k2
R47 "RC0805JR-072K2L" RESC200X125X60L35 3122.05,1140.83 r0 top value=2k2
R48 "RC0805JR-0710RL" RESC200X125X60L35 2846.46,1231.38 r0 top value=10
R49 "RC0805JR-072K2L" RESC200X125X60L35 2618.11,1247.13 r0 top value=2k2
R50 "RC0805JR-072K2L" RESC200X125X60L35 2480.32,1384.92 r0 top value=2k2
R51 "RC0805JR-072K2L" RESC200X125X60L35 2594.49,1361.3 r270 top value=2k2
R52 "RC0805JR-072K2L" RESC200X125X60L35 2618.11,1156.57 r0 top value=2k2
R53 "RC0805JR-072K2L" RESC200X125X60L35 3051.18,1255 r90 top value=2k2
R54 "RC0805JR-071KL" RESC200X125X60L35 2413.39,1218.5 r0 bottom value=1k
R55 "RC0805JR-0710RL" RESC200X125X60L35 2964.57,1010.91 r90 top value=10
R56 "RC0805JR-0710RL" RESC200X125X60L35 3511.81,1136.89 r90 top value=10
R57 "RC0805JR-071KL" RESC200X125X60L35 2311.02,1468.5 r270 bottom value=1k
R58 "RC0805JR-071KL" RESC200X125X60L35 3281.9,736.16 r0 bottom value=1k
R59 "RC0805JR-0710RL" RESC200X125X60L35 3507.87,728.35 r270 top value=10
R60 "RC0805JR-0710RL" RESC200X125X60L35 2862.2,850.39 r270 top value=10
R61 "RC0805JR-071KL" RESC200X125X60L35 3165.76,975.33 r270 bottom value=1k
R62 "RC0805JR-072K2L" RESC200X125X60L35 2480.32,487.28 r0 top value=2k2
R63 "RC0805JR-072K2L" RESC200X125X60L35 2594.49,510.91 r90 top value=2k2
R64 "RC0805JR-072K2L" RESC200X125X60L35 2618.11,715.63 r0 top value=2k2
R65 "RC0805JR-072K2L" RESC200X125X60L35 2618.11,625.08 r0 top value=2k2
R66 "RC0805JR-072K2L" RESC200X125X60L35 3051.18,617.2 r270 top value=2k2
R67 "RC0805JR-0710RL" RESC200X125X60L35 2846.46,640.83 r180 top value=10
R68 "RC0805JR-072K2L" RESC200X125X60L35 2846.46,731.38 r0 top value=2k2
R69 "RC0805JR-072K2L" RESC200X125X60L35 3122.05,731.38 r0 top value=2k2
R70 "RC0805JR-072K2L" RESC200X125X60L35 2984.25,731.38 r0 top value=2k2
R71 "RC0805JR-0710RL" RESC200X125X60L35 3358.27,601.46 r180 top value=10
R72 "RC0805JR-072K2L" RESC200X125X60L35 2846.46,156.57 r0 top value=2k2
R73 "RC0805JR-072K2L" RESC200X125X60L35 2984.25,156.57 r0 top value=2k2
R74 "RC0805JR-072K2L" RESC200X125X60L35 3122.05,156.57 r0 top value=2k2
R75 "RC0805JR-0710RL" RESC200X125X60L35 2846.46,247.13 r0 top value=10
R76 "RC0805JR-072K2L" RESC200X125X60L35 2618.11,258.94 r0 top value=2k2
R77 "RC0805JR-0747RL" RESC200X125X60L35 2173.23,1051.18 r0 bottom value=47
R78 "RC0805JR-072K2L" RESC200X125X60L35 2480.32,396.73 r0 top value=2k2
R79 "RC0805JR-072K2L" RESC200X125X60L35 2594.49,373.11 r270 top value=2k2
R80 "RC0805JR-072K2L" RESC200X125X60L35 2618.11,168.39 r0 top value=2k2
R81 "RC0805JR-072K2L" RESC200X125X60L35 3051.18,270.75 r90 top value=2k2
R82 "RC0805JR-0710RL" RESC200X125X60L35 2348.43,333.74 r270 top value=10
R83 "RC0805JR-0747RL" RESC200X125X60L35 1590.55,1235.24 r270 top value=47
R84 "RC0805JR-0710RL" RESC200X125X60L35 3507.87,160.51 r90 top value=10
R85 "RC0805JR-07100RL" RESC200X125X60L35 614.17,2094.49 r90 bottom value=100
R89 "RC0805JR-07100RL" RESC200X125X60L35 704.72,2094.49 r90 bottom value=100
R91 "RC0805JR-070RL" RESC200X125X60L35 409.45,1933.07 r180 bottom value=0
R92 "RC0805JR-07100RL" RESC200X125X60L35 1086.61,468.5 r180 bottom value=100
R93 "RC0805JR-07100RL" RESC200X125X60L35 614.17,1077.56 r90 bottom value=100
R94 "RC0805JR-07100RL" RESC200X125X60L35 704.72,1077.56 r90 bottom value=100
R95 "RC0805JR-070RL" RESC200X125X60L35 413.39,908.27 r180 bottom value=0
R96 "RC0805JR-07100RL" RESC200X125X60L35 1086.61,267.72 r180 bottom value=100
R97 "RC0805JR-0747RL" RESC200X125X60L35 2177.17,846.46 r180 bottom value=47
R98 "RC0805JR-071KL" RESC200X125X60L35 4443.9,2120.08 r0 bottom value=1k
R99 "RC0805JR-071KL" RESC200X125X60L35 4328.74,2324.8 r270 bottom value=1k
R101 "RC0805JR-071KL" RESC200X125X60L35 3958.66,2124.02 r0 bottom value=1k
R102 "RC0805JR-071KL" RESC200X125X60L35 3844.49,2240.16 r270 bottom value=1k
R103 "RC0805JR-071KL" RESC200X125X60L35 4556.26,1112.63 r270 top value=1k
R104 "RC0805JR-071KL" RESC200X125X60L35 4465.71,1112.63 r270 top value=1k
R105 "RC0805JR-071KL" RESC200X125X60L35 4351.54,1089.01 r0 top value=1k
R106 "RC0805JR-071KL" RESC200X125X60L35 4343.66,990.58 r0 top value=1k
R107 "RC0805JR-071KL" RESC200X125X60L35 4347.6,1455.15 r180 top value=1k
R108 "RC0805JR-071KL" RESC200X125X60L35 4323.98,1340.98 r270 top value=1k
R109 "RC0805JR-071KL" RESC200X125X60L35 4201.93,1333.1 r180 top value=1k
R110 "RC0805JR-071KL" RESC200X125X60L35 3920.44,990.58 r180 top value=1k
R111 "RC0805JR-071KL" RESC200X125X60L35 3917.32,1515.75 r180 bottom value=1k
R112 "RC0805JR-071KL" RESC200X125X60L35 4178.31,1813.42 r270 top value=1k
R113 "RC0805JR-071KL" RESC200X125X60L35 4178.31,1675.62 r270 top value=1k
R114 "RC0805JR-071KL" RESC200X125X60L35 4340.55,1653.54 r0 bottom value=1k
R115 "RC0805JR-071KL" RESC200X125X60L35 4268.86,1675.62 r270 top value=1k
R116 "RC0805JR-071KL" RESC200X125X60L35 3709.81,1112.63 r270 top value=1k
R117 "RC0805JR-071KL" RESC200X125X60L35 3800.36,1112.63 r270 top value=1k
R118 "RC0805JR-071KL" RESC200X125X60L35 3914.53,1089.01 r180 top value=1k
R119 "RC0805JR-071KL" RESC200X125X60L35 3914.53,1455.15 r0 top value=1k
R120 "RC0805JR-071KL" RESC200X125X60L35 3938.15,1340.98 r270 top value=1k
R121 "RC0805JR-071KL" RESC200X125X60L35 4064.14,1333.1 r0 top value=1k
R122 "RC0805JR-071KL" RESC200X125X60L35 4087.76,1813.42 r270 top value=1k
R123 "RC0805JR-071KL" RESC200X125X60L35 4087.76,1675.62 r270 top value=1k
R124 "RC0805JR-071KL" RESC200X125X60L35 3997.21,1675.62 r270 top value=1k
SW1 "416131160803" 416131160803 1488.58,3237.4 r90 top
X1 "C_P" C_P 610.63,3434.25 r90 top value=0
X2 "C_P" C_P 138.19,3434.25 r90 top value=0
X3 "C_P" C_P 295.67,3434.25 r90 top value=0
X4 "C_P" C_P 453.15,3434.25 r90 top value=0
X5 "C_P" C_P 4464.57,1980.32 r180 top value=0
X6 "C_P" C_P 1480.32,633.86 r90 top value=0
X7 "Обозначение при заказе" HC-49 894.09,2653.15 r270 top
X8 "C_P" C_P 1027.56,799.21 r90 top value=0
X9 "C_P" C_P 2307.09,1228.35 r90 top value=0
X10 "C_P" C_P 2366.14,665.35 r90 top value=0
X11 "C_P" C_P 3535.43,854.33 r90 top value=0
X12 "C_P" C_P 3366.14,968.5 r90 top value=0
X13 "C_P" C_P 4515.75,2685.04 r180 top value=0
X14 "C_P" C_P 4224.41,2527.56 r180 top value=0
X15 "Обозначение при заказе" NC3FAAH2 780.31,1764.57 r90 top locked
X16 "Обозначение при заказе" ST-008G-04 17.72,370.08 r0 top locked
X17 "Обозначение при заказе" NC3FAAH2 779.53,740.55 r90 top locked
X19 "Обозначение при заказе" ST-008G-04 4665.35,381.89 r180 top locked
X20 "C_P" C_P 4484.25,2244.09 r180 top value=0
X21 "C_P" C_P 4035.43,2007.87 r180 top value=0

## Footprints (in the part's own frame and the unit in brackets; to place one, negate y for a bottom-side part, rotate by r counter-clockwise, add the part's x,y. Pads: shape width x height; smd on the part's side, far side on the other; paste and mask are expansions set on the pad)
"48-QFN (6x6)" [mm] "6x6 mm, pitch 0.4 mm, power pad"
  round 0.7 hole 0.3: 0(-1.5,1.5) 0(-1.5,0) 0(-1.5,-1.5) 0(0,1.5) 0(0,0) 0(0,-1.5) 0(1.5,1.5) 0(1.5,0) 0(1.5,-1.5)
  rect 4.4x4.4 smd: 0(0,0)
  rect 0.8x0.25 smd: 1(-2.9,2.2) 2(-2.9,1.8) 3(-2.9,1.4) 4(-2.9,1) 5(-2.9,0.6) 6(-2.9,0.2) 7(-2.9,-0.2) 8(-2.9,-0.6) 9(-2.9,-1) 10(-2.9,-1.4) 11(-2.9,-1.8) 12(-2.9,-2.2) 25(2.9,-2.2) 26(2.9,-1.8) 27(2.9,-1.4) 28(2.9,-1) 29(2.9,-0.6) 30(2.9,-0.2) 31(2.9,0.2) 32(2.9,0.6) 33(2.9,1) 34(2.9,1.4) 35(2.9,1.8) 36(2.9,2.2)
  rect 0.25x0.8 smd: 13(-2.2,-2.9) 14(-1.8,-2.9) 15(-1.4,-2.9) 16(-1,-2.9) 17(-0.6,-2.9) 18(-0.2,-2.9) 19(0.2,-2.9) 20(0.6,-2.9) 21(1,-2.9) 22(1.4,-2.9) 23(1.8,-2.9) 24(2.2,-2.9) 37(2.2,2.9) 38(1.8,2.9) 39(1.4,2.9) 40(1,2.9) 41(0.6,2.9) 42(0.2,2.9) 43(-0.2,2.9) 44(-0.6,2.9) 45(-1,2.9) 46(-1.4,2.9) 47(-1.8,2.9) 48(-2.2,2.9)
  round 0.5 on Mech1 mask+0: ""(-2.5,2.5)
  silkscreen extent -3.72,-3 3,3.13, body extent -3.02,-3.02 3.02,3.02, height 0.85
416131160803 [mm] "03p, 1.27mm Pitch, Horizontal, HP Type, SMT, flat Actuator, black, with Tape, T&R"
  rrect25% 0.7x1.27 smd: 1(-1.27,-3.81) 2(0,-3.81) 3(1.27,-3.81) 4(1.27,3.81) 5(0,3.81) 6(-1.27,3.81)
  silkscreen extent -2.42,-4 2.42,2.8, body extent -2.42,-4 2.43,4, height 2.06
adum1400 [mm]
  rect 0.6x2.2 smd: 1(-4.445,-4.6) 2(-3.175,-4.6) 3(-1.905,-4.6) 4(-0.635,-4.6) 5(0.635,-4.6) 6(1.905,-4.6) 7(3.175,-4.6) 8(4.445,-4.6) 9(4.445,4.6) 10(3.175,4.6) 11(1.905,4.6) 12(0.635,4.6) 13(-0.635,4.6) 14(-1.905,4.6) 15(-3.175,4.6) 16(-4.445,4.6)
  silkscreen extent -6,-6 5.5,6, body extent -6.4,-5.15 6.4,5.15, height 2.64
AM3D-0509DH30Z [mm]
  round 1.5 hole 0.7: 1(0,1.27) 2(2.54,1.27) 4(7.62,1.27) 5(10.16,1.27) 6(12.7,1.27) 7(15.24,1.27)
  silkscreen extent -2.54,-5.08 17.78,2.54, body extent -2.42,-3.9 17.23,2.1, height 10.16
AM3D-0509SZ [mm]
  round 1.5 hole 0.7: 1(0,1.27) 2(2.54,1.27) 4(7.62,1.27) 5(10.16,1.27) 6(12.7,1.27) 7(15.24,1.27)
  silkscreen extent -2.54,-5.08 17.78,2.54, body extent -2.22,-3.8 17.43,2.2, height 10.16
C_P [mm]
  round 2 smd: 1(0,0)
CAPAE1030X1050L320X90N [mm] "Capacitor, Aluminum Electrolytic; 10.30 mm L X 10.30 mm W X 10.50 mm H body"
  rrect23% 4x2.15 smd: 1(-4.245,0) 2(4.245,0)
  silkscreen extent -5.25,-5.26 5.25,5.26, body extent -5.5,-5.15 5.5,5.15, height 10.5
CAPC200X125X95L50N [mm] "Capacitor, Chip; 2.00 mm L X 1.25 mm W X 0.95 mm H body"
  rrect48% 1.1x1.4 smd: 1(-0.95,0) 2(0.95,0)
  silkscreen extent -0.3,-0.9 0.3,0.9, body extent -1,-0.62 1,0.63, height 0.95
CAPC320X160X180L55 [mm] "Capacitor, Chip; 3.20 mm L X 1.60 mm W X 1.80 mm H body"
  rrect36% 1.4x1.8 smd: 1(-1.6,0) 2(1.6,0)
  silkscreen extent -0.61,-0.85 0.61,0.85, body extent -1.6,-0.8 1.6,0.8, height 1.8
DIL4 [mm]
  round 1.5 hole 0.6: 1(0,0) 2(7.62,0) 3(7.62,7.62) 4(0,7.62)
  silkscreen extent -2.54,-2.54 10.16,10.16, body extent -2.8,-2.8 10.4,10.4, height 5.4
FCI-61729-1011BLF_V [mm] "THD, 4-Leads, Body 16x12.2mm"
  round 1.45 hole 0.92: 1(1.25,2.355) 2(-1.25,2.355) 3(-1.25,0.355) 4(1.25,0.355)
  round 2.8 hole 2.3: 5(6.02,-2.355) 6(-6.02,-2.355)
  silkscreen extent -6.1,-12.63 6.1,4.09, body extent -6.56,-12.58 6.56,3.37, height 11
HC-49 [mm]
  round 1.03 hole 0.63: 1(-2.44,0) 2(2.44,0)
  silkscreen extent -5.68,-2.33 5.68,2.33, body extent -5.7,-2.5 5.65,2.5, height 13.56
INDM320X250X220L90X200N [mm] "Inductor, Molded Body; 3.20 mm L X 2.50 mm W X 2.20 mm H body"
  round 1 smd: 1(-1.15,0) 2(1.15,0)
  Top Layer region: -2.75,0.5 -2.75,-0.5 -1.75,-0.5 -1.75,-1.1 -0.65,-1.1 -0.65,1.1 -1.75,1.1 -1.75,0.5
  Top Layer region: 2.75,-0.5 2.75,0.5 1.75,0.5 1.75,1.1 0.65,1.1 0.65,-1.1 1.75,-1.1 1.75,-0.5
  silkscreen extent -1.75,-1.45 1.75,1.45, body extent -1.6,-1.25 1.6,1.25, height 2.2
INDM730X730X450L90X180N [mm] "Inductor, Molded Body; 7.30 mm L X 7.30 mm W X 4.50 mm H body"
  rrect12% 1.6x2.2 smd: 1(-3.2,0) 2(3.2,0)
  silkscreen extent -3.95,-3.95 3.95,3.95, body extent -3.75,-3.75 3.75,3.75, height 4.5
NC3FAAH2 [mm]
  rect 2.4x2.4 / inner round 2.4 / far side rect 2.4x2.4 hole 1.6: 1(8.69,6.8)
  round 2.4 hole 1.6: 2(16.31,6.165)
  round 1.8 hole 1.2: 3(12.5,2.355) G(4.245,12.515)
  round 1.6 hole 1.6 unplated: ""(8.69,15.69) ""(16.31,10.61)
  silkscreen extent -0.6,0 25,19.5, body extent 0,-0.2 25.34,26.2, height 29.65
QFP50P900X900X160-48N [mm]
  rrect50% 1.56x0.28 smd: 1(-4.18,2.75) 2(-4.18,2.25) 3(-4.18,1.75) 4(-4.18,1.25) 5(-4.18,0.75) 6(-4.18,0.25) 7(-4.18,-0.25) 8(-4.18,-0.75) 9(-4.18,-1.25) 10(-4.18,-1.75) 11(-4.18,-2.25) 12(-4.18,-2.75) 25(4.18,-2.75) 26(4.18,-2.25) 27(4.18,-1.75) 28(4.18,-1.25) 29(4.18,-0.75) 30(4.18,-0.25) 31(4.18,0.25) 32(4.18,0.75) 33(4.18,1.25) 34(4.18,1.75) 35(4.18,2.25) 36(4.18,2.75)
  rrect50% 0.28x1.56 smd: 13(-2.75,-4.18) 14(-2.25,-4.18) 15(-1.75,-4.18) 16(-1.25,-4.18) 17(-0.75,-4.18) 18(-0.25,-4.18) 19(0.25,-4.18) 20(0.75,-4.18) 21(1.25,-4.18) 22(1.75,-4.18) 23(2.25,-4.18) 24(2.75,-4.18) 37(2.75,4.18) 38(2.25,4.18) 39(1.75,4.18) 40(1.25,4.18) 41(0.75,4.18) 42(0.25,4.18) 43(-0.25,4.18) 44(-0.75,4.18) 45(-1.25,4.18) 46(-1.75,4.18) 47(-2.25,4.18) 48(-2.75,4.18)
  silkscreen extent -6.15,-3.6 3.6,3.6, body extent -4.5,-4.5 4.5,4.5, height 1.48
RESC200X125X60L35 [mm] "Resistor, Chip; 2.00 mm L X 1.25 mm W X 0.60 mm H body"
  rrect46% 1.1x1.4 smd: 1(-0.95,0) 2(0.95,0)
  silkscreen extent -0.3,-0.9 0.3,0.9, body extent -1,-0.63 1,0.62, height 0.6
RESC310X160X65L40N [mm] "Resistor, Chip; 3.10 mm L X 1.60 mm W X 0.65 mm H body"
  rrect36% 1.4x1.8 smd: 1(-1.6,0) 2(1.6,0)
  silkscreen extent -0.61,-0.85 0.61,0.85, body extent -1.55,-0.8 1.55,0.8, height 0.65
RK09L [mm]
  round 3 hole 2: 0(-5.8,-4.7) 0(-5.8,4.7)
  round 2 hole 1.2: 1(-2.5,2.5) 2(-2.5,0) 3(-2.5,-2.5) 4(0,-2.5) 5(0,0) 6(0,2.5)
  silkscreen extent -7.5,-7.5 5,7.5, body extent -7.3,-6.05 20.1,6.05, height 11.85
SOIC8P127_490X600X175L65X42N [mm] "Small Outline IC (SOIC), 1.27 mm pitch; 8 pin, 4.905 mm L X 3.90 mm W X 1.75 mm H body"
  rect 1.6x0.65 smd: 1(-2.7,1.905)
  rrect49% 1.6x0.65 smd: 2(-2.7,0.635) 3(-2.7,-0.635) 4(-2.7,-1.905) 5(2.7,-1.905) 6(2.7,-0.635) 7(2.7,0.635) 8(2.7,1.905)
  silkscreen extent -3.39,-2.53 2,2.53, body extent -3,-2.45 3,2.45, height 1.75
SOIC8P127_490X600X175L83X42N [mm] "Small Outline IC (SOIC), 1.27 mm pitch; 8 pin, 4.905 mm L X 3.90 mm W X 1.75 mm H body"
  rect 2.1x0.65 smd: 1(-2.44,1.905)
  rrect49% 2.1x0.65 smd: 2(-2.44,0.635) 3(-2.44,-0.635) 4(-2.44,-1.905) 5(2.44,-1.905) 6(2.44,-0.635) 7(2.44,0.635) 8(2.44,1.905)
  silkscreen extent -3.39,-2.53 2,2.53, body extent -3,-2.45 3,2.45, height 1.75
SOIC8P127_528X790X100L65X41N [mm] "Small Outline IC, 1.27 mm pitch; 8 pin, 5.33 mm L X 5.33 mm W X 2.16 mm H body"
  rect 1.7x0.65 smd: 1(-3.554,1.905)
  rrect49% 1.7x0.65 smd: 2(-3.554,0.635) 3(-3.554,-0.635) 4(-3.554,-1.905) 5(3.554,-1.905) 6(3.554,-0.635) 7(3.554,0.635) 8(3.554,1.905)
  silkscreen extent -4.3,-2.72 2.51,2.72, body extent -3.95,-2.62 3.95,2.62, height 2.16
SOP65P490X110-9N [mm]
  rrect25% 1.47x0.48 smd: 1(-2.15,0.975) 2(-2.15,0.325) 3(-2.15,-0.325) 4(-2.15,-0.975) 5(2.15,-0.975) 6(2.15,-0.325) 7(2.15,0.325) 8(2.15,0.975)
  rect 1.425x1.76 smd paste-2: 9(0,0)
  silkscreen extent -3.72,-1.54 1.5,1.56
SOT23-5P95_280X145L45X40N [mm] "Small Outline Transistor (SOT23), 0.95 mm pitch; 5 pin, 2.90 mm L X 1.60 mm W X 1.45 mm H body"
  rect 0.65x1.16 smd: 1(-0.95,-1.23)
  rrect51% 0.65x1.16 smd: 2(0,-1.23) 3(0.95,-1.23) 4(0.95,1.23) 5(-0.95,1.23)
  silkscreen extent -1.55,-1.71 1.55,0.88, body extent -1.45,-1.4 1.45,1.4, height 1.45
SOT23-6P95_280X145L45X40N [mm] "Small Outline Transistor (SOT23), 0.95 mm pitch; 6 pin, 2.90 mm L X 1.60 mm W X 1.45 mm H body"
  rect 1.16x0.6 smd mask+0.05: 1(-1.23,0.95)
  rrect51% 1.16x0.6 smd mask+0.05: 2(-1.23,0) 3(-1.23,-0.95) 4(1.23,-0.95) 5(1.23,0) 6(1.23,0.95)
  silkscreen extent -1.71,-1.65 0.88,1.65, body extent -1.4,-1.45 1.4,1.45, height 1.45
ST-008G-04 [mm]
  round 4 hole 2.5: 1(7.5,0) 2(22.5,2.5) 3(22.5,-2.5)
  silkscreen extent 0,-7.5 27.5,7.5
TANT_B [mm]
  rrect50% 1.6x2.8 smd: 1(0,0) 2(3.5,0)
  silkscreen extent -1.75,-1.75 4.75,1.75, body extent 0,-1.3 3.5,1.5, height 2.1
TANT_D [mm]
  rrect50% 2.6x2.6 smd: 1(0,0) 2(7.3,0)
  silkscreen extent -2.2,-2.3 9,2.3, body extent -0.05,-2.2 7.25,2.1, height 3.1

## Part data
C1 C3 C7 C8 C11 C15 C16 C17 C18 C19 C20 C21 C22 C23 C24 C25 C26 C27 C28 C29 C32 C35 C37 C39 C42 C44 C46 C47 C48 C49 C50 C54 C55 C56 C58 C59 C60 C63 C64 C66 C67 C68 C70 C71 C72 C74 C75 C76 C77 C78 C79 C80 C81 C85 C87 C88 C89 C90 C91 C92 C93 C94 C95 C98 C99 C101 C102 C106 C107 C108 C109 C110 C113 C114 C115 C120 C121 C122 C123 C124 C125 C126 C127 C128 C129 C130 C131 C132 C133 C134 C137 C139 C143 C144 C146 C149 C154 C155 C156 C159 C160 C161 C162 C165 C166 C167 C168 C169 C170 C171 C174 C175 C176 C179 C180 C181 C182 C183 C185 C186 C187 C188: "Ceramic capacitor 0805 X7R 0.1µF 50V", Capacitance=100nF, Case Code (Imperial)=0805, Case Code (Metric)=2012, Dielectric=X7R, Manufacturer 1=Yageo, Max Operating Temperature=125°C, Min Operating Temperature=-55°C, Supplier Part Number 1=311-4351-1-ND, Tolerance=20%, Voltage=50V, Case/Package=0805, Category="Ceramic Capacitors", ComponentLink1Description=https://datasheet.ciiva.com/13207/upy-gphc-x7r-6-3v-to-50v-8-12304-13207535.pdf?src-supplier=Mouser, ComponentLink1URL=https://datasheet.ciiva.com/13207/upy-gphc-x7r-6-3v-to-50v-8-12304-13207535.pdf?src-supplier=Mouser, Depth=1.25mm, Halogen Free="Halogen Free", Lead Free="Lead Free", Length=0.079inch, Manufacturer Part Number 1=CC0805MRX7R9BB104, Mount=SMT, Packaging="Tape and Reel", Pricing 1="1=0,15000, 10=0,10700, 50=0,06080, 100=0,05040, 500=0,03536, 1000=0,02927 (USD)", RoHS=Yes, RoHS Compliant=Yes, Series=CC, Stock 1=29978, Supplier 1=Digi-Key, Thickness=0.037inch, Type=Конденсатор, Voltage Rating=50V, Voltage Rating (DC)=50V, Width=0.049inch
C2 C5 C9 C31 C34 C36 C38 C41 C43 C52 C53 C61 C62 C82 C83 C96 C97 C100 C103 C104 C105 C111 C112 C116 C117 C118 C119 C136 C140 C157 C158 C163 C164 C177 C178 C184: library part TANT_B, "Описание свойств компонента"
C4: "Aluminium capacitor 10x10.2 1000 µF 10 V", Capacitance=1mF, Case Code (Metric)=10x10.2, Case/Package="10x10,2 (SMD-2)", Dielectric Material=Aluminium, ESR (Equivalent Series Resistance)=80mR, Leakage Current=100uA, Manufacturer 2=Panasonic, Manufacturer Part Number 2=EEE-FK1A102AP, Max Operating Temperature=105°C, Min Operating Temperature=-55°C, Package Quantity=500, Ripple Current=850mA, Supplier Part Number 1=EEE-FK1E471GP, Tolerance=20%, Voltage=10V, Category="Aluminum Electrolytic Capacitors", ComponentLink1Description=https://datasheet.ciiva.com/11783/0900766b80bed286-11783449.pdf?src-supplier=RSComponents, ComponentLink1URL=https://datasheet.ciiva.com/11783/0900766b80bed286-11783449.pdf?src-supplier=RSComponents, ComponentLink2Description=https://datasheet.ciiva.com/43454/58258-43454698.pdf?src-supplier=Farnell, ComponentLink2URL=https://datasheet.ciiva.com/43454/58258-43454698.pdf?src-supplier=Farnell, ComponentLink3Description=https://datasheet.ciiva.com/46388/58258-46388200.pdf?src-supplier=Element14, ComponentLink3URL=https://datasheet.ciiva.com/46388/58258-46388200.pdf?src-supplier=Element14, ComponentLink4Description=https://datasheet.ciiva.com/24024/aba0000ce120-24024165.pdf?src-supplier=Mouser, ComponentLink4URL=https://datasheet.ciiva.com/24024/aba0000ce120-24024165.pdf?src-supplier=Mouser, ComponentLink5Description=https://datasheet.ciiva.com/14602/70068081-14602683.pdf?src-supplier=Allied+Electronics, ComponentLink5URL=https://datasheet.ciiva.com/14602/70068081-14602683.pdf?src-supplier=Allied+Electronics, ComponentLink6Description=https://datasheet.ciiva.com/14607/70068081-14607445.pdf?src-supplier=Allied+Electronics, ComponentLink6URL=https://datasheet.ciiva.com/14607/70068081-14607445.pdf?src-supplier=Allied+Electronics, ComponentLink7Description=https://datasheet.ciiva.com/2985/aba0000ce119-2985368.pdf?src-supplier=Avnet, ComponentLink7URL=https://datasheet.ciiva.com/2985/aba0000ce119-2985368.pdf?src-supplier=Avnet, ComponentLink8Description=https://datasheet.ciiva.com/2985/aba0000ce119-2985367.pdf?src-supplier=Avnet, ComponentLink8URL=https://datasheet.ciiva.com/2985/aba0000ce119-2985367.pdf?src-supplier=Avnet, Construction=Cylindrical, Contact Plating=Tin, Diameter=10mm, Dissipation Factor=0.19%, Height=10.2mm, Height - Seated (Max)=0.402inch, Impedance=80mR, Lead Free="Lead Free", Lead Length=3.5mm, Lead Pitch=4.6mm, Length=10.2mm, Life (Hours)=2000Hour, Mount=SMT, Number of Pins=2, Packaging="Tape and Reel", Pricing 2="1=0,75620, 500=0,34460 (USD)", Radiation Hardening=No, REACH SVHC=Unknown, Ripple Current (AC)=850mA, RoHS=Yes, RoHS Compliant=Yes, Series=FK, Stock 2=4, Supplier 1=Avnet, Supplier 2="Arrow Electronics", Termination=SMD/SMT, Type="Конденсатор электролитический", Voltage Rating=10V, Voltage Rating (DC)=10V, Width=10.3mm
C6 C10 C14: "Ceramic capacitor 0805 C0G 16pF 50V", Capacitance=22pF, Case Code (Imperial)=0805, Case Code (Metric)=2012, Dielectric=C0G, Dielectric Material=Ceramic, Manufacturer 1=Yageo, Manufacturer Part Number 1=CC0805JRNPO9BN220, Max Operating Temperature=125°C, Min Operating Temperature=-55°C, Package Quantity=1, Supplier Part Number 1=311-1103-1-ND, Tolerance=5%, Voltage=50V, Case/Package=0805, Category="Ceramic Capacitors", ComponentLink1Description=https://datasheet.ciiva.com/144/mlccorderingcode-144745.pdf?src-supplier=Digi-Key, ComponentLink1URL=https://datasheet.ciiva.com/144/mlccorderingcode-144745.pdf?src-supplier=Digi-Key, ComponentLink2Description=https://datasheet.ciiva.com/8033/1734582-8033931.pdf?src-supplier=Element14, ComponentLink2URL=https://datasheet.ciiva.com/8033/1734582-8033931.pdf?src-supplier=Element14, ComponentLink3Description=https://datasheet.ciiva.com/8033/1734582-8033933.pdf?src-supplier=Element14, ComponentLink3URL=https://datasheet.ciiva.com/8033/1734582-8033933.pdf?src-supplier=Element14, ComponentLink4Description=https://datasheet.ciiva.com/144/mlccorderingcode-144746.pdf?src-supplier=Digi-Key, ComponentLink4URL=https://datasheet.ciiva.com/144/mlccorderingcode-144746.pdf?src-supplier=Digi-Key, ComponentLink5Description=https://datasheet.ciiva.com/144/mlccorderingcode-144747.pdf?src-supplier=Digi-Key, ComponentLink5URL=https://datasheet.ciiva.com/144/mlccorderingcode-144747.pdf?src-supplier=Digi-Key, ComponentLink6Description=https://datasheet.ciiva.com/13264/upy-gp-np0-16v-to-50v-8-3714-13264491.pdf?src-supplier=Mouser, ComponentLink6URL=https://datasheet.ciiva.com/13264/upy-gp-np0-16v-to-50v-8-3714-13264491.pdf?src-supplier=Mouser, Construction=Flat, Depth=1.25mm, Height=0.6mm, Lead Free="Lead Free", Length=2mm, Manufacturer 2=Yageo, Manufacturer Part Number 2=CC0805JRNPO9BN160, Mount=SMT, Number of Pins=2, Packaging="Tape and Reel", Pricing 1="1=0,11000, 10=0,07800, 50=0,04280, 100=0,03490, 500=0,02492, 1000=0,01958 (USD)", Pricing 2="1=0,15000, 10=0,10700, 50=0,06080, 100=0,05040, 500=0,03536, 1000=0,02927 (USD)", Radiation Hardening=No, REACH SVHC="No SVHC", Resistor Type=Ceramic, RoHS=Yes, RoHS Compliant=Yes, Series=CC, Stock 1=117464, Stock 2=956, Supplier 1=Digi-Key, Supplier 2=Digi-Key, Supplier Part Number 2=311-4228-1-ND, Termination=SMD/SMT, Thickness=0.024inch, Type=Конденсатор, Voltage Rating=50V, Voltage Rating (DC)=50V, Weight=0.000194oz, Width=1.25mm
C12 C13: "Ceramic capacitor 0805 NPO 22pF 16V", Capacitance=22pF, Case Code (Imperial)=0805, Case Code (Metric)=2012, Dielectric=C0G, Dielectric Material=Ceramic, Manufacturer 1=Yageo, Manufacturer Part Number 1=CC0805JRNPO9BN220, Max Operating Temperature=125°C, Min Operating Temperature=-55°C, Package Quantity=1, Supplier Part Number 1=311-1103-1-ND, Tolerance=5%, Voltage=50V, Case/Package=0805, Category="Ceramic Capacitors", ComponentLink1Description=https://datasheet.ciiva.com/144/mlccorderingcode-144745.pdf?src-supplier=Digi-Key, ComponentLink1URL=https://datasheet.ciiva.com/144/mlccorderingcode-144745.pdf?src-supplier=Digi-Key, ComponentLink2Description=https://datasheet.ciiva.com/8033/1734582-8033931.pdf?src-supplier=Element14, ComponentLink2URL=https://datasheet.ciiva.com/8033/1734582-8033931.pdf?src-supplier=Element14, ComponentLink3Description=https://datasheet.ciiva.com/8033/1734582-8033933.pdf?src-supplier=Element14, ComponentLink3URL=https://datasheet.ciiva.com/8033/1734582-8033933.pdf?src-supplier=Element14, ComponentLink4Description=https://datasheet.ciiva.com/144/mlccorderingcode-144746.pdf?src-supplier=Digi-Key, ComponentLink4URL=https://datasheet.ciiva.com/144/mlccorderingcode-144746.pdf?src-supplier=Digi-Key, ComponentLink5Description=https://datasheet.ciiva.com/144/mlccorderingcode-144747.pdf?src-supplier=Digi-Key, ComponentLink5URL=https://datasheet.ciiva.com/144/mlccorderingcode-144747.pdf?src-supplier=Digi-Key, Construction=Flat, Depth=1.25mm, Height=0.6mm, Lead Free="Lead Free", Length=2mm, Mount=SMT, Number of Pins=2, Packaging="Tape and Reel", Pricing 1="1=0,11000, 10=0,07800, 50=0,04280, 100=0,03490, 500=0,02492, 1000=0,01958 (USD)", Radiation Hardening=No, REACH SVHC="No SVHC", Resistor Type=Ceramic, RoHS=Yes, RoHS Compliant=Yes, Series=CC, Stock 1=117464, Supplier 1=Digi-Key, Termination=SMD/SMT, Thickness=0.024inch, Type=Конденсатор, Voltage Rating=50V, Voltage Rating (DC)=50V, Width=1.25mm